# Altium PCB Copy before routing of BetaBake..PcbDoc (part 1 of 4)
Units mil, origin at the board's own origin, x right, y up, seen from the top; angles counter-clockwise.
Board outline 6000 x 4000 mil, 8 copper layers (Top Layer, GND Plein, Signal 2, PWR, GND Plein 2, Signal 3, GND Plein 3, Bottom Layer), stack 40.468 mil thick; 436 components, 343 nets, 1746 pads, 14 vias.
Unrouted connection lines stored in the file: 1158.
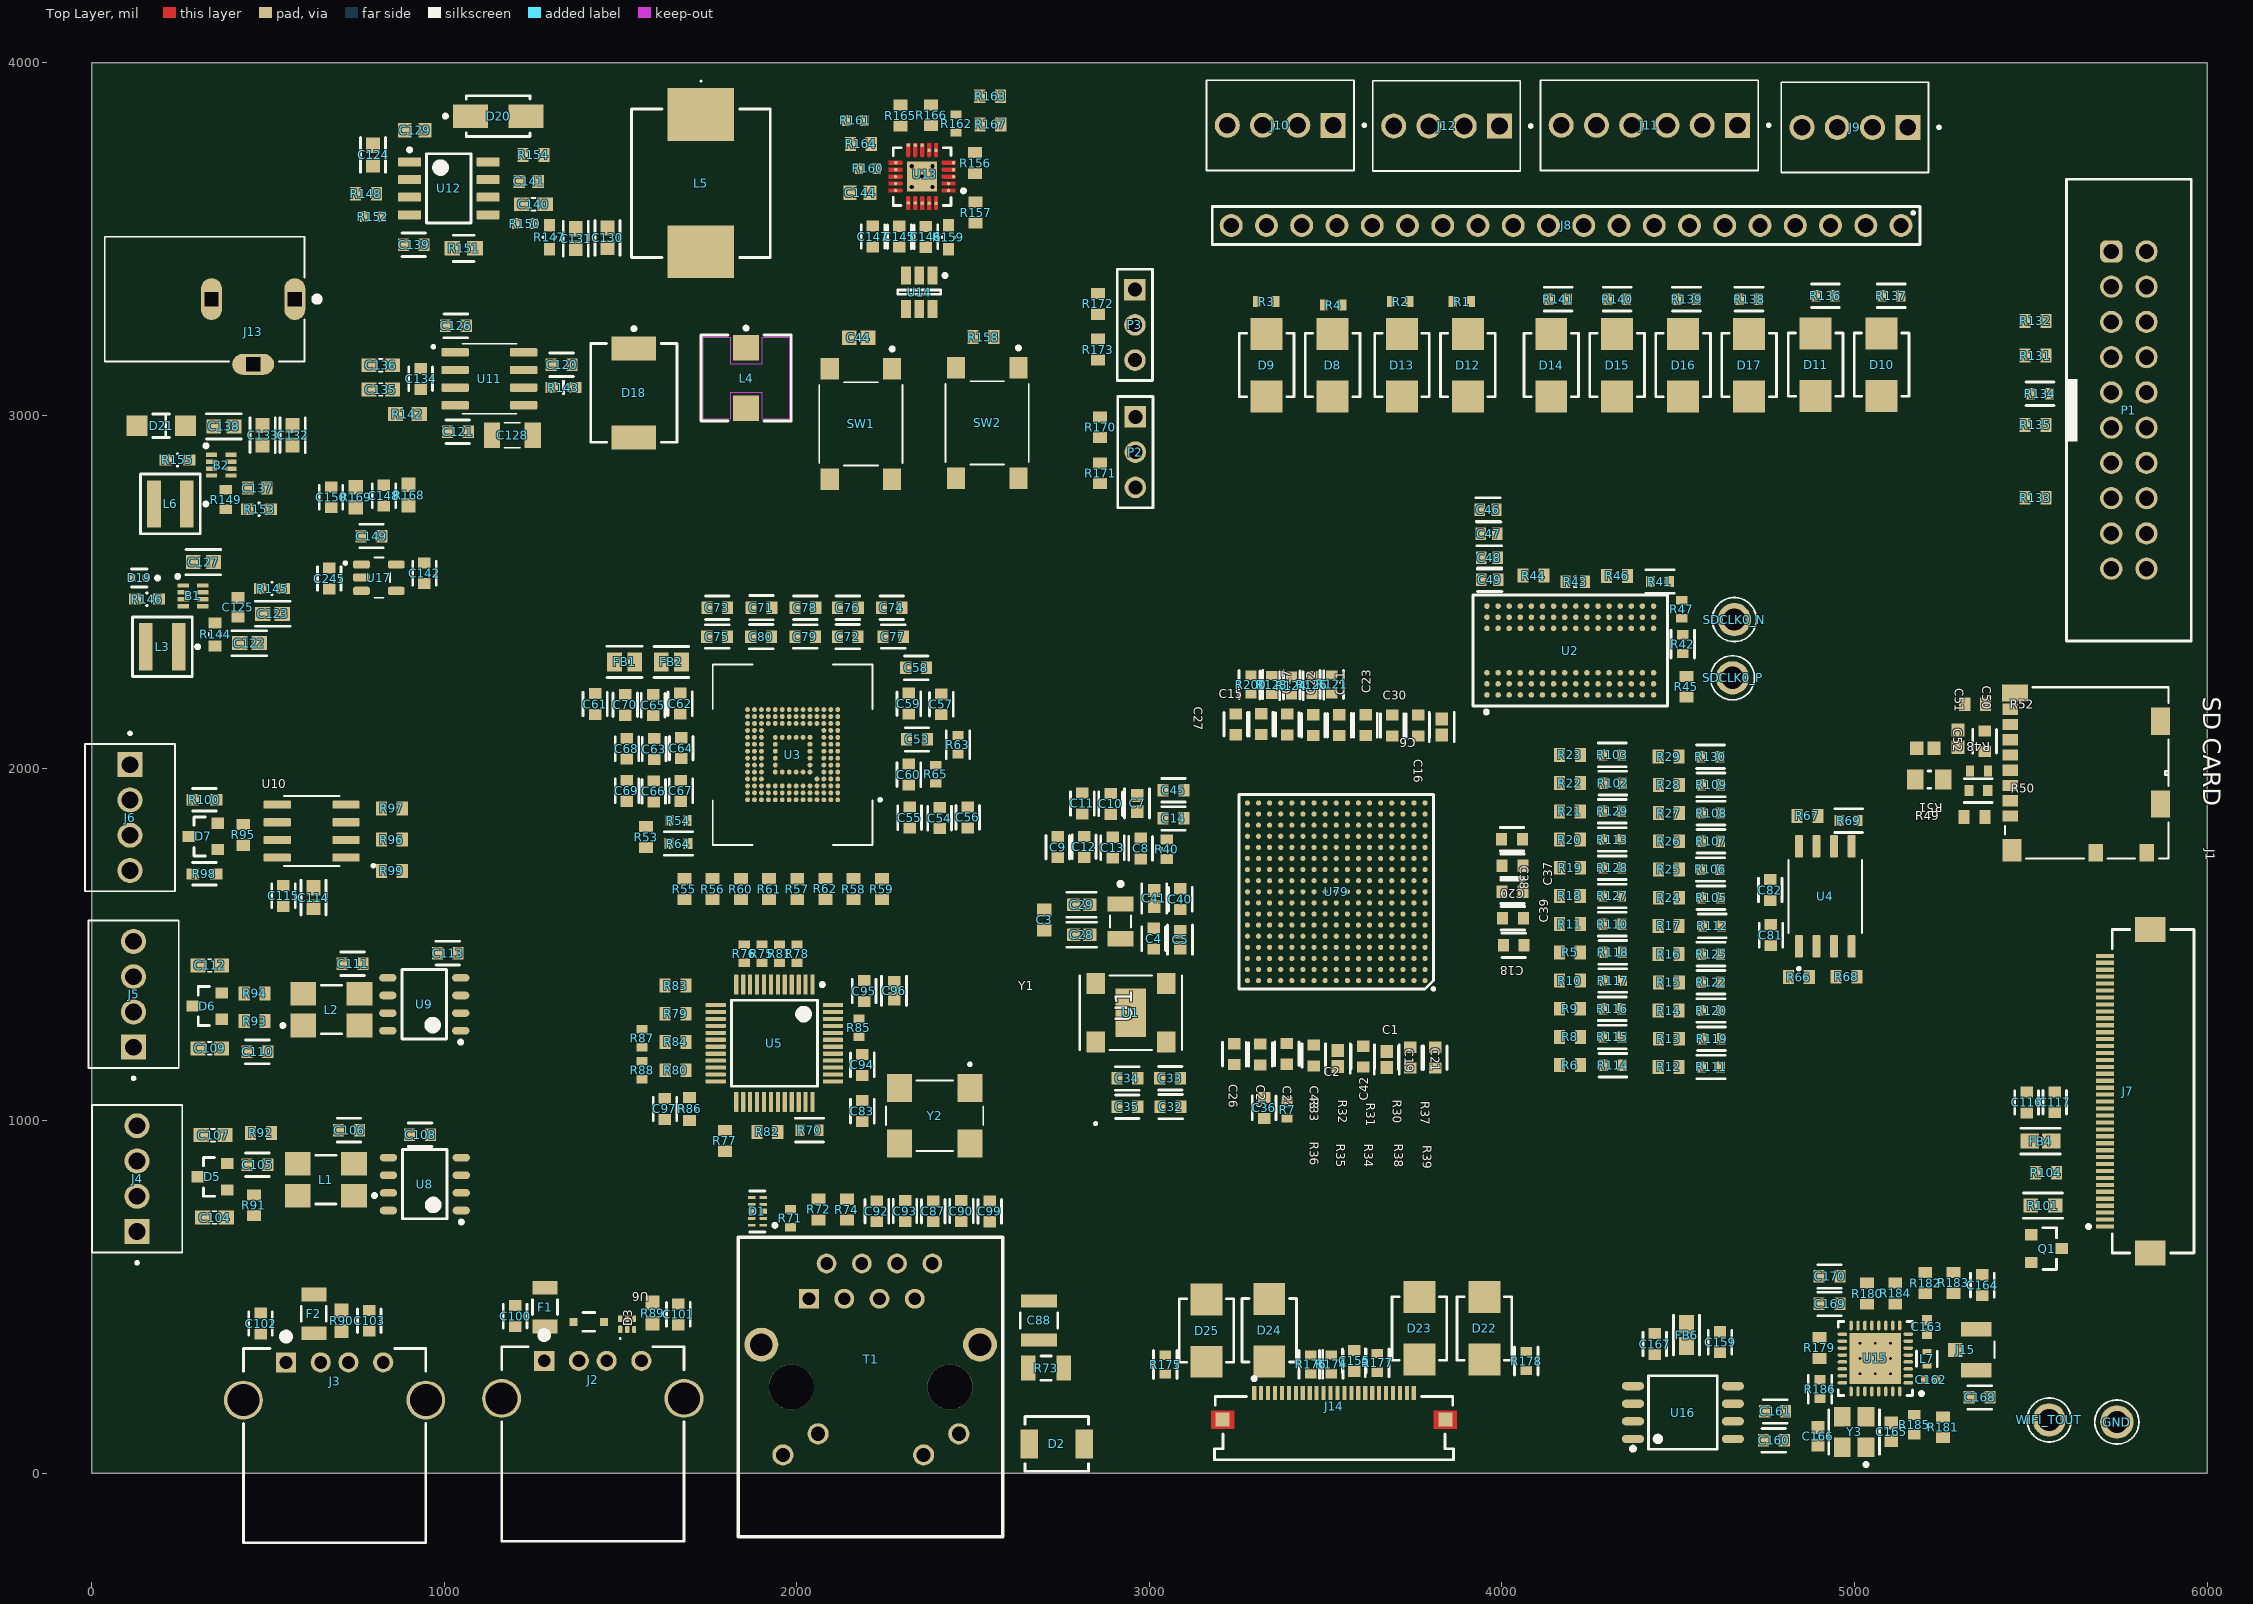
[diagram p0: Top Layer view]
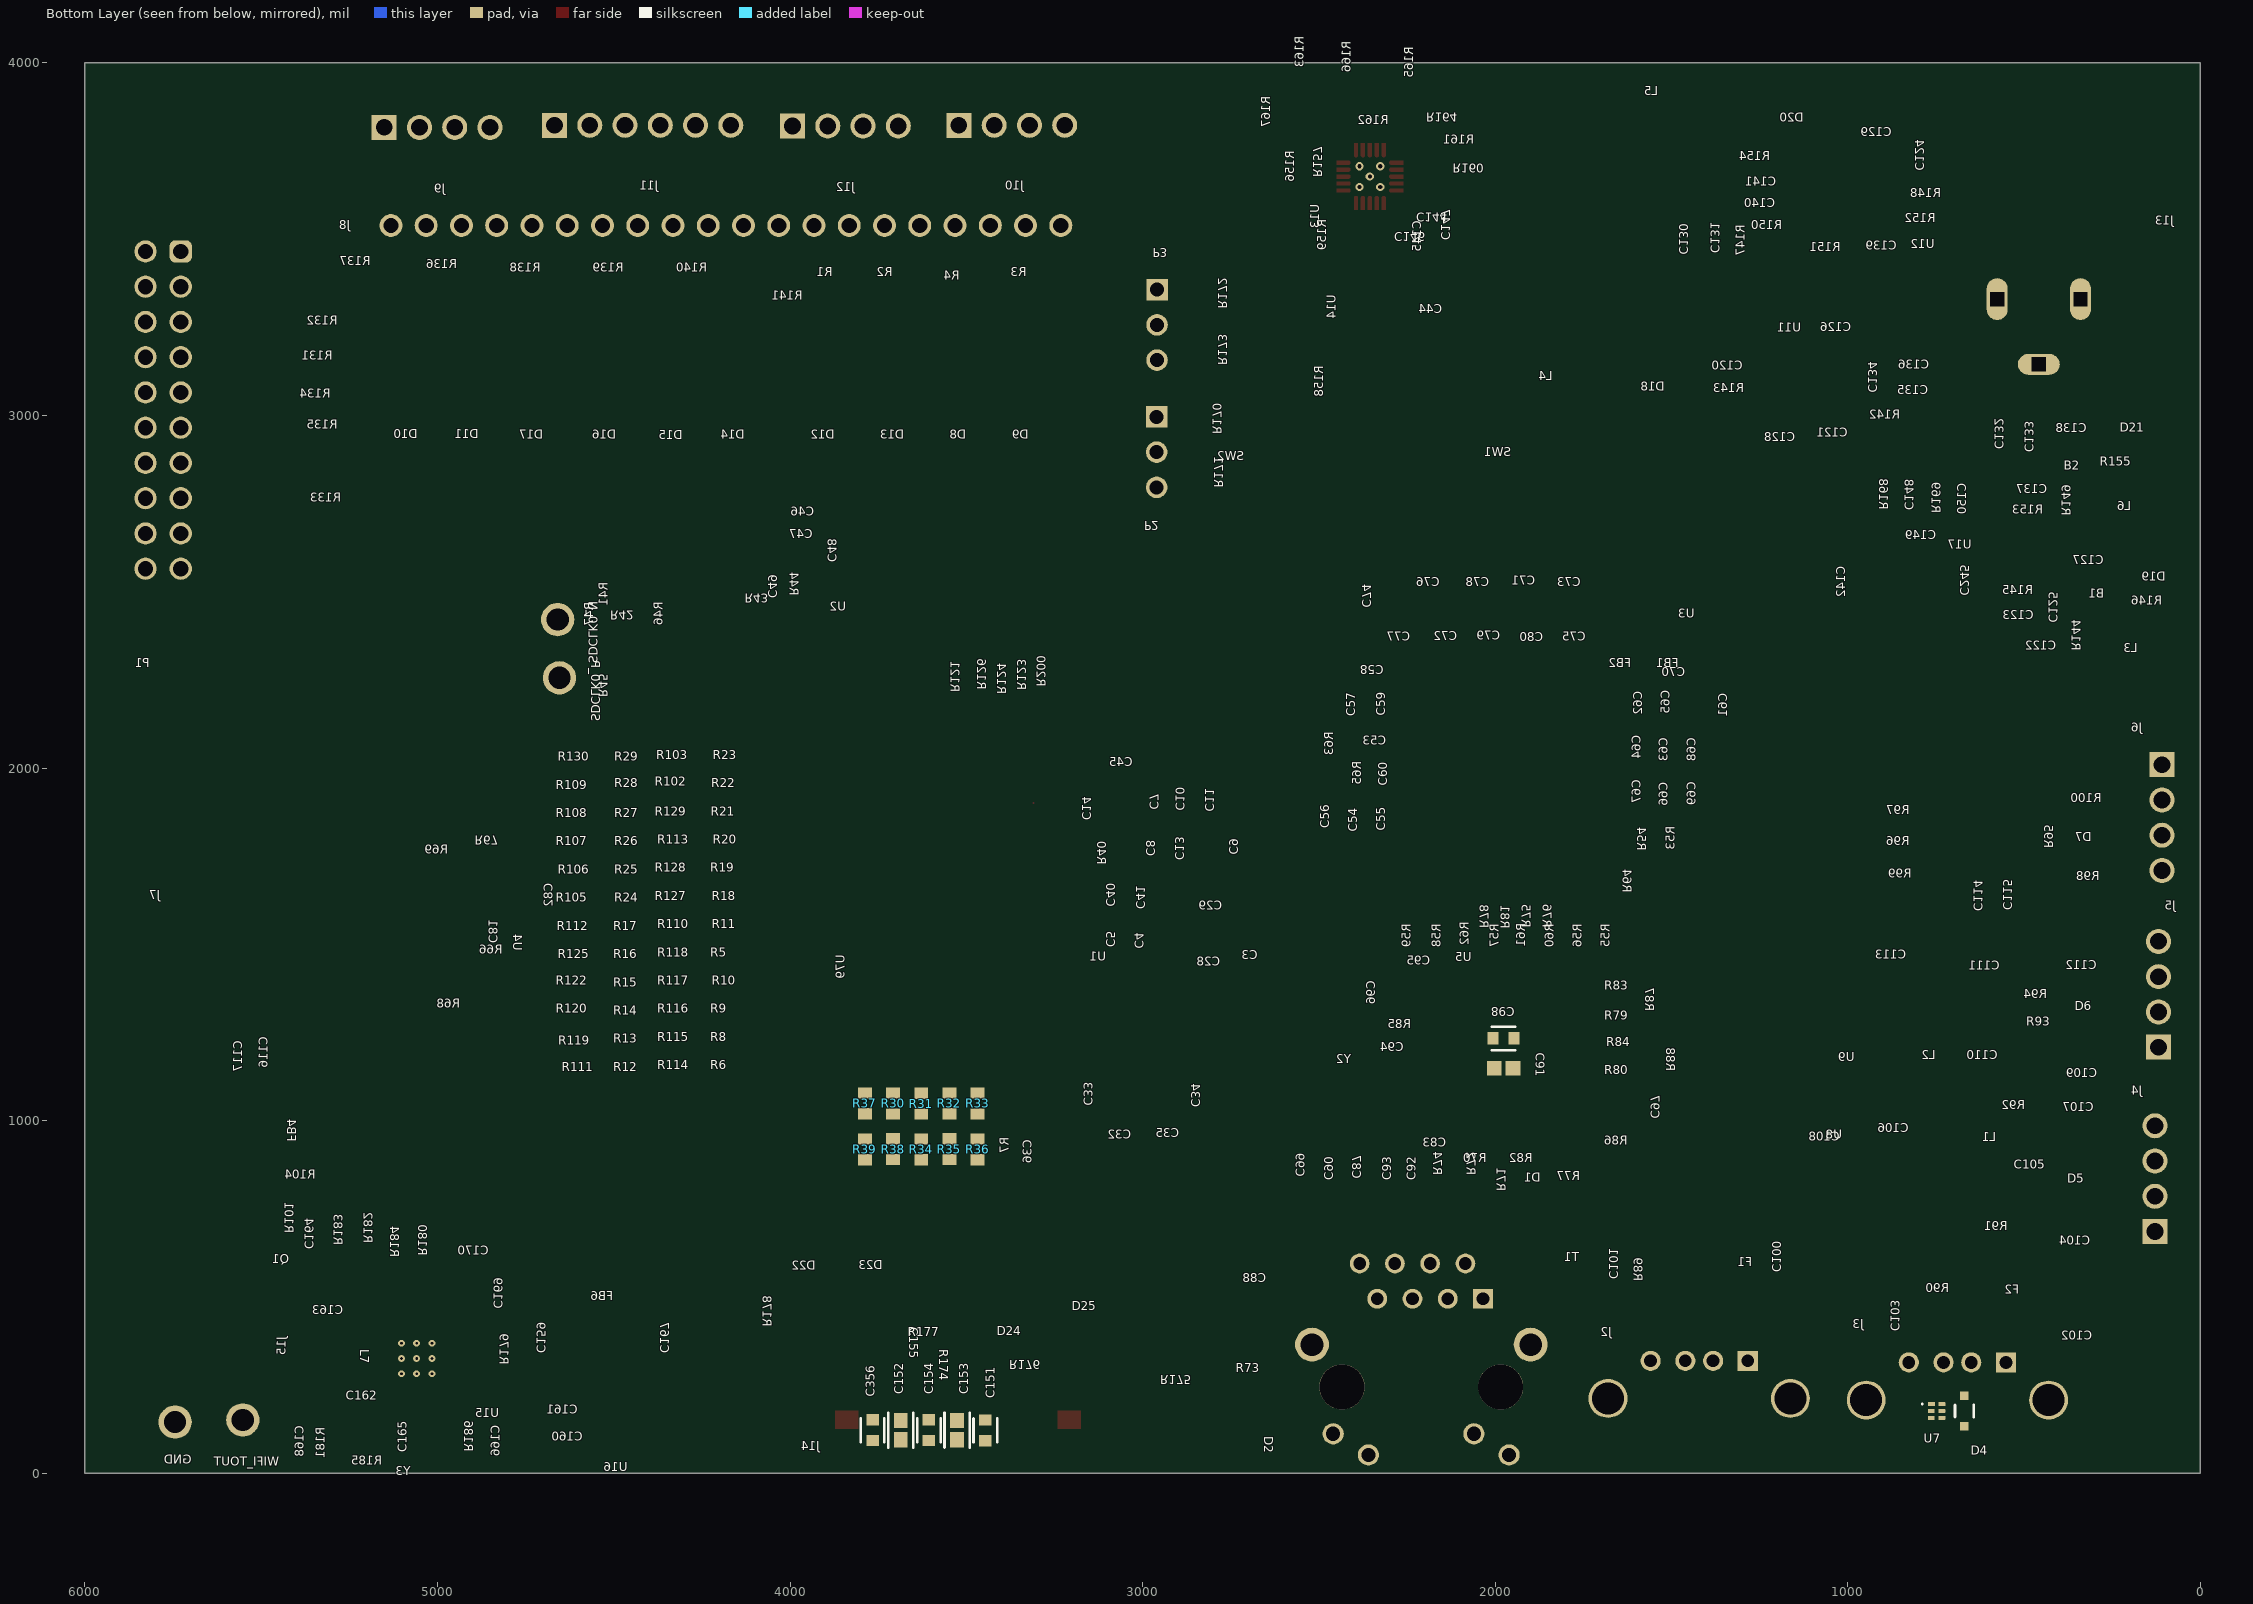
[diagram p1: Bottom Layer view, seen from below]
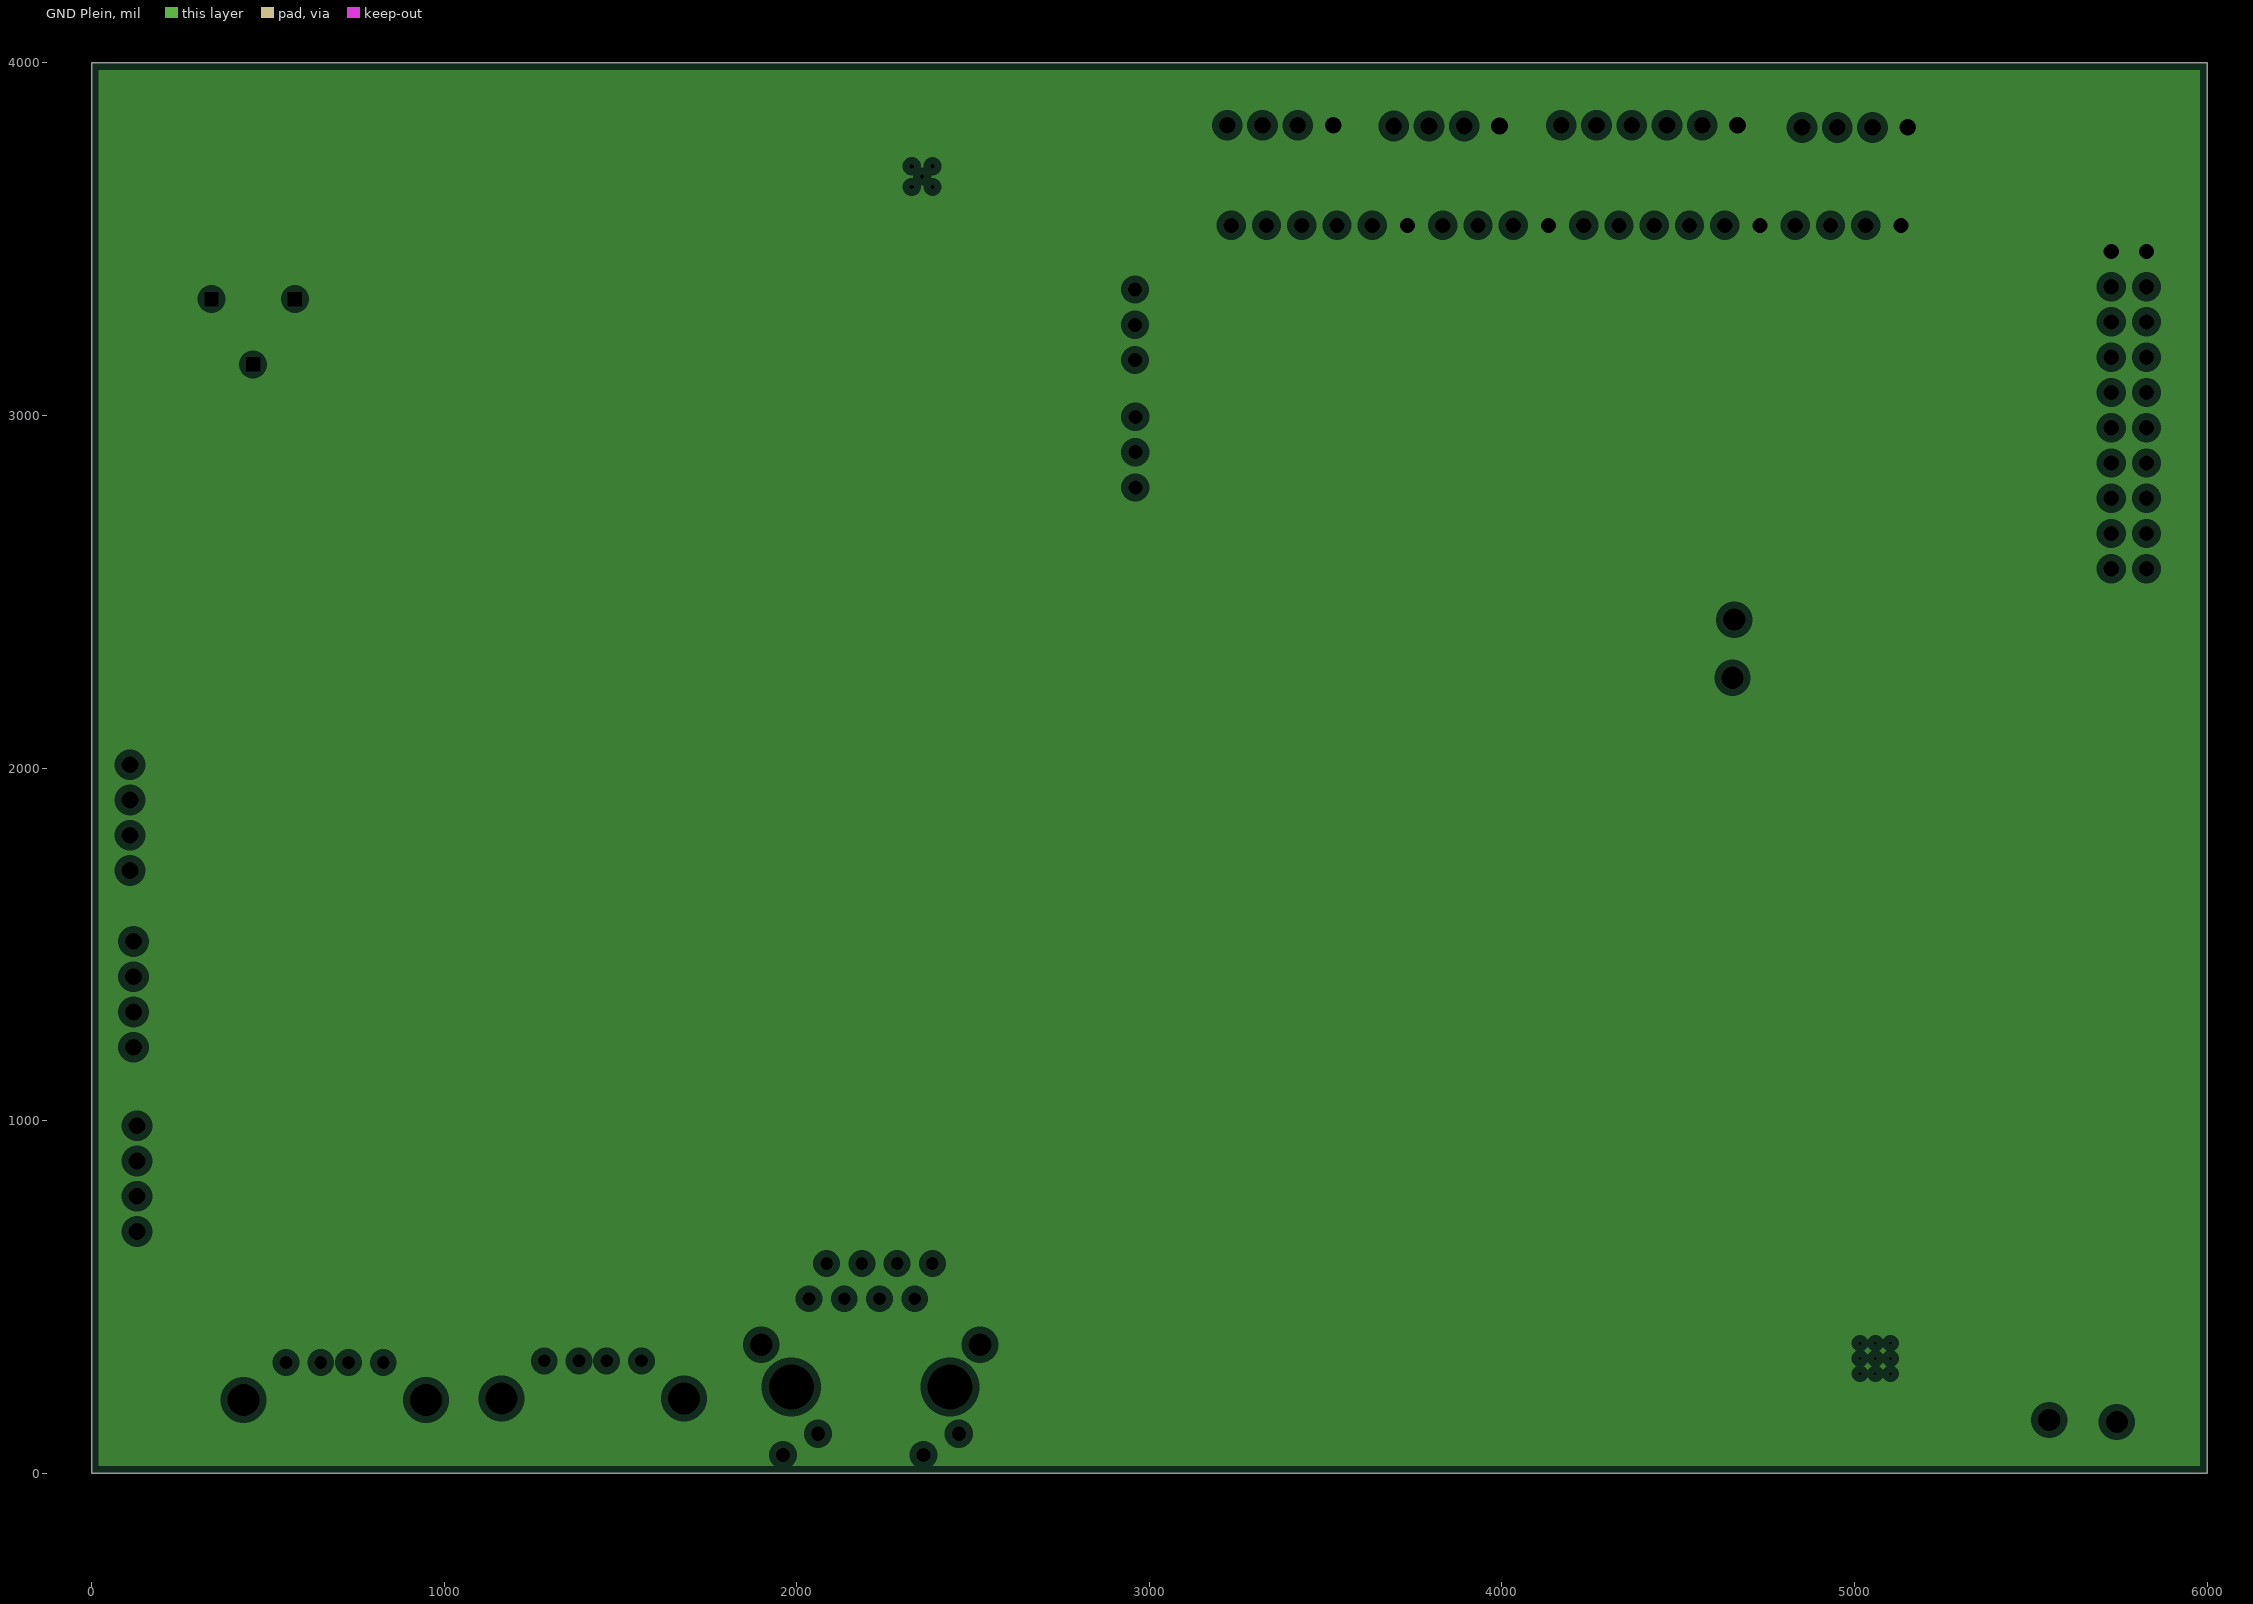
[diagram p2: GND Plein, clearances drawn from the general rule]
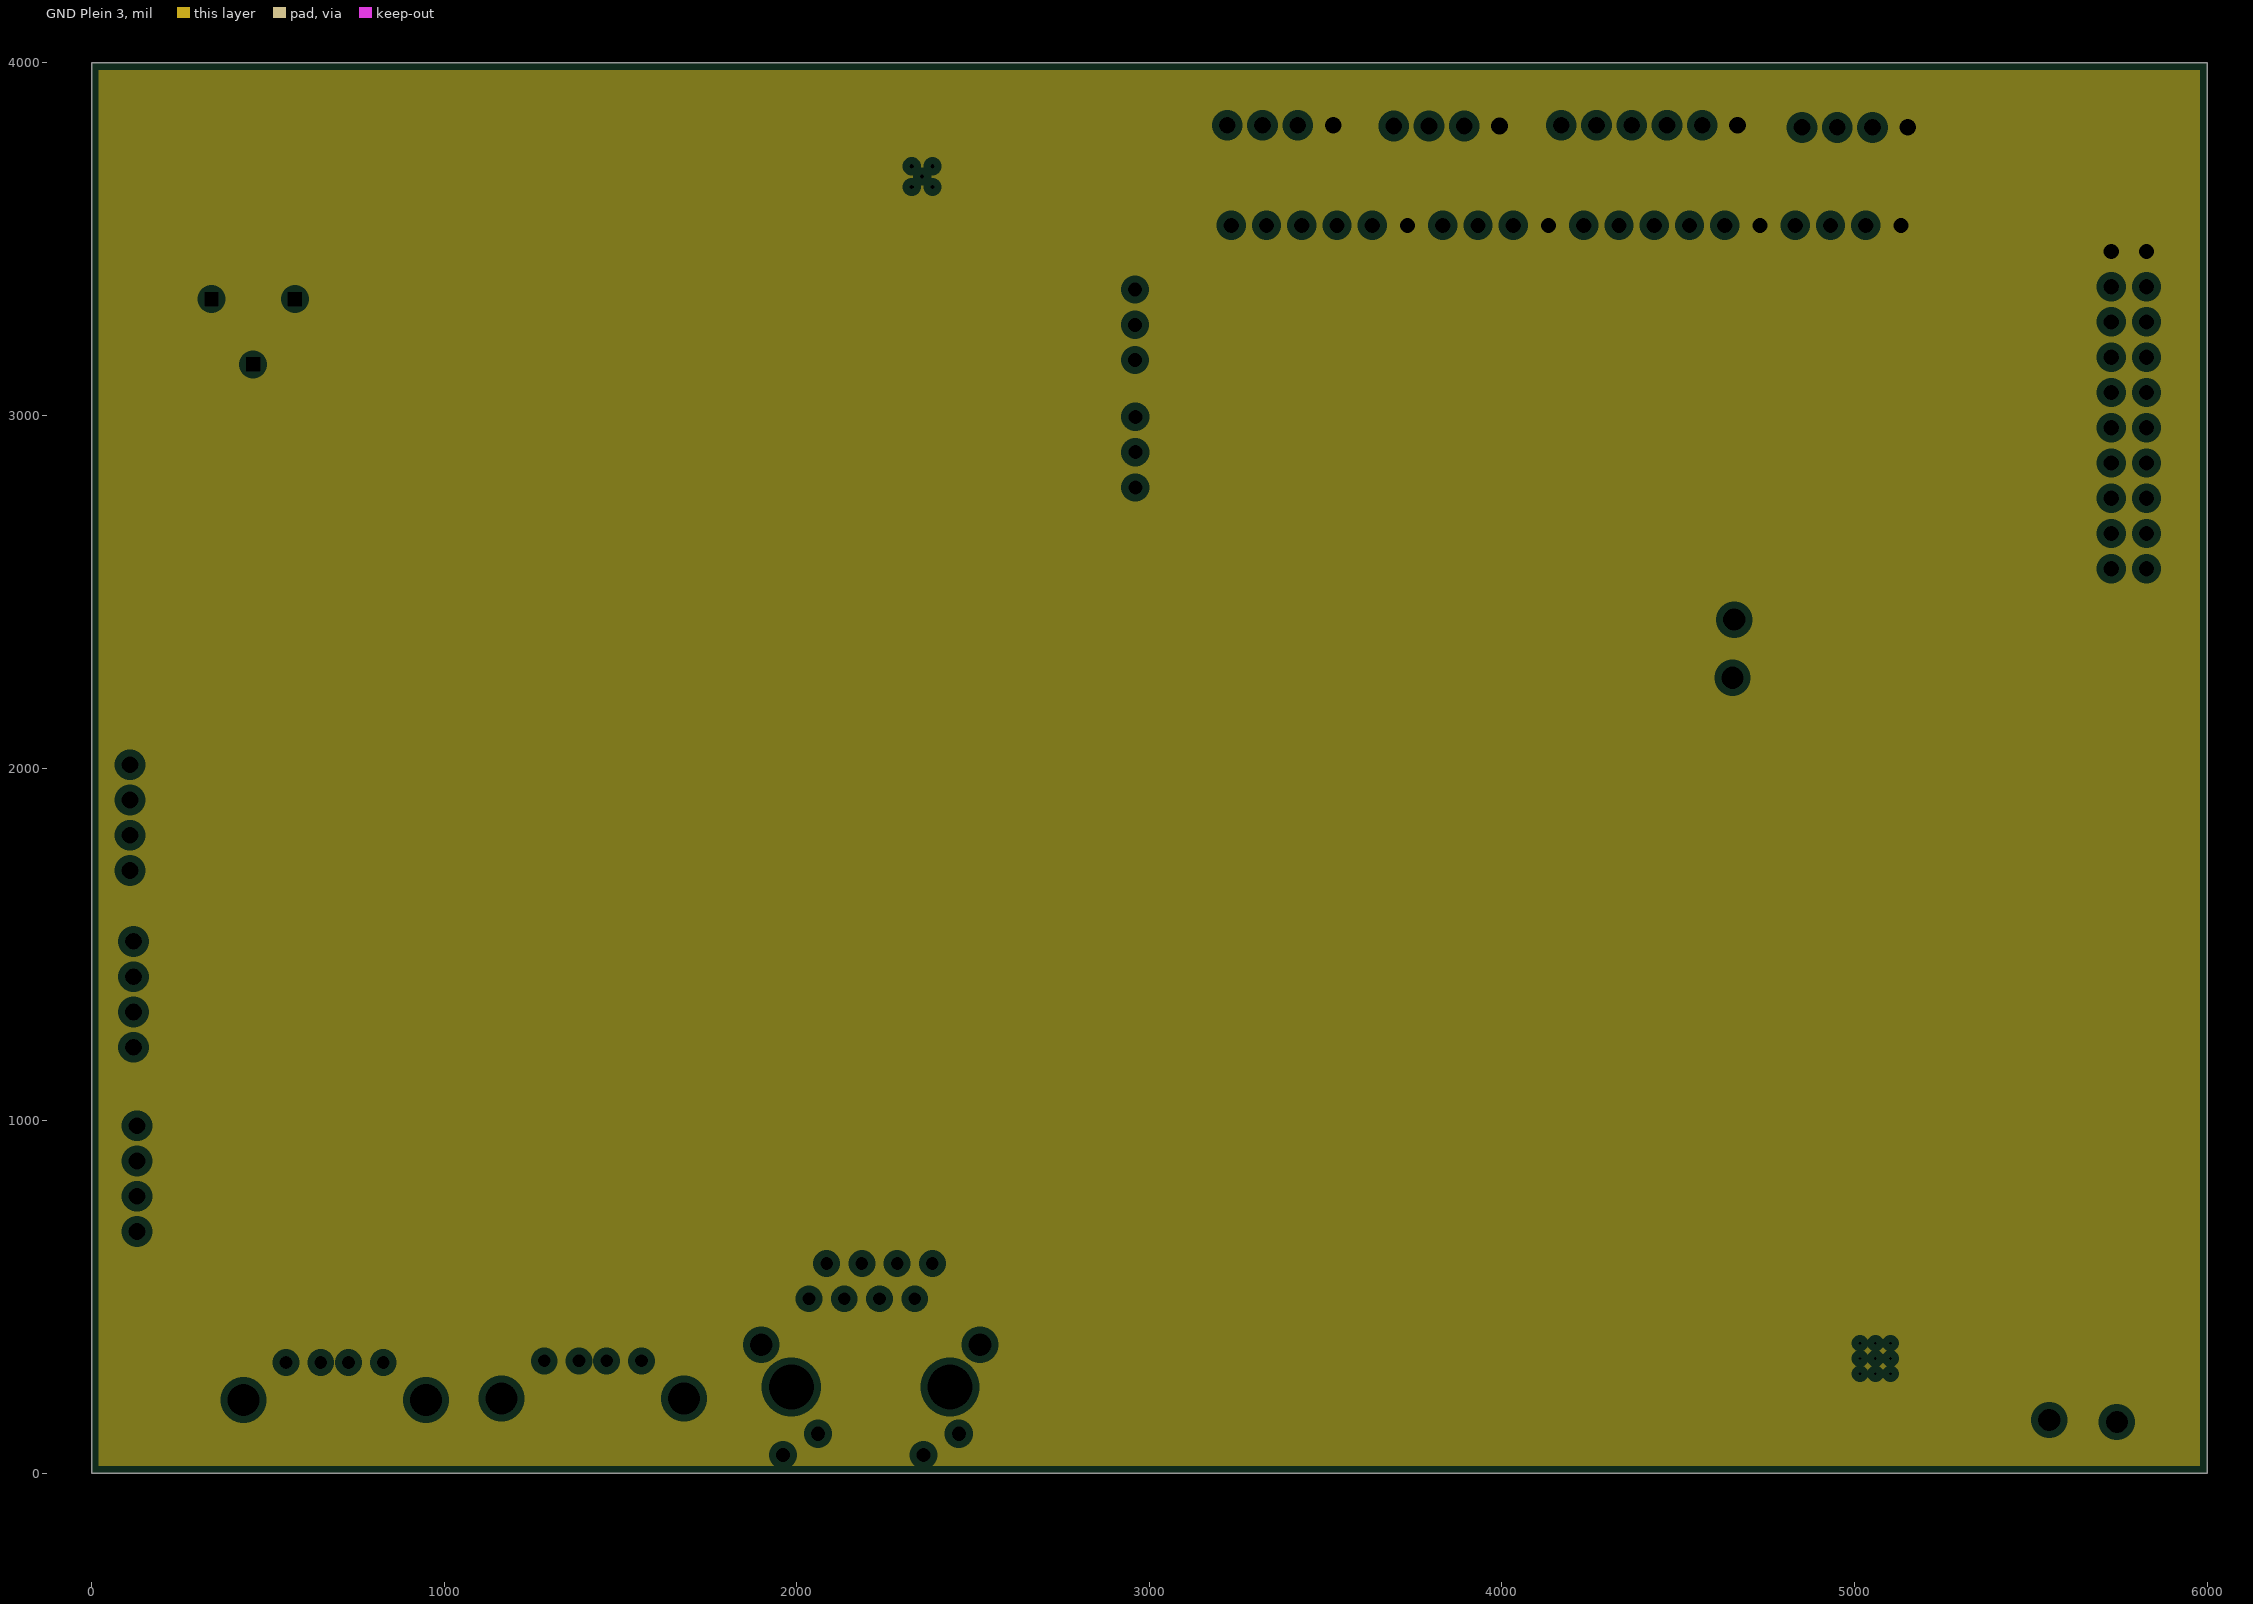
[diagram p3: GND Plein 3, clearances drawn from the general rule]

## Layer stack, top to bottom
Top Solder: solder mask 0.4, Solder Resist, Dk 3.5
Top Layer: signal copper 1.4
Dielectric 4: prepreg 2.8, PP-006, Dk 4.1
GND Plein: plane copper 1.378, net NVCC_CSI
Dielectric 2: prepreg 2.8, PP-006, Dk 4.1
Signal 2: signal copper 1.378
Dielectric 6: prepreg 2.8, PP-006, Dk 4.1
PWR: signal copper 1.378
Dielectric 1: dielectric 12.6, FR-4, Dk 4.8
GND Plein 2: signal copper 1.378
Dielectric 7: prepreg 2.8, PP-006, Dk 4.1
Signal 3: signal copper 1.378
Dielectric 3: prepreg 2.8, PP-006, Dk 4.1
GND Plein 3: plane copper 1.378, net NVCC_CSI
Dielectric 5: prepreg 2.8, PP-006, Dk 4.1
Bottom Layer: signal copper 1.4
Bottom Solder: solder mask 0.4, Solder Resist, Dk 3.5

## Board outline
0,0 6000,0 6000,4000 0,4000

## Design rules (kind name [scope] priority, off if disabled: settings)
Clearance [All] p1: gap=5 ignorepadtopadclearanceinfootprint=FALSE
DiffPairsRouting [All] p1: maxlimit=10 minlimit=10 mostfreqgap=10 toplayer_minwidth=15 toplayer_maxwidth=15 toplayer_prefwidth=15 midlayer1_minwidth=15 midlayer1_maxwidth=15 midlayer1_prefwidth=15 midlayer2_minwidth=15 midlayer2_maxwidth=15 midlayer2_prefwidth=15 midlayer3_minwidth=15 midlayer3_maxwidth=15 midlayer3_prefwidth=15 midlayer4_minwidth=15 midlayer4_maxwidth=15 midlayer4_prefwidth=15 bottomlayer_minwidth=15 bottomlayer_maxwidth=15 bottomlayer_prefwidth=15 maxuncoupledlength=500
PlaneClearance [All] p1: clearance=20
PlaneConnect [All] p1: planeconnectstyle=Relief reliefexpansion=20 reliefentries=4 reliefconductorwidth=10 reliefairgap=10
PolygonConnect [All] p1: connectstyle=Relief reliefconductorwidth=10 reliefentries=4 polygonreliefangle="90 Angle" airgapwidth=10
RoutingVias [All] p1: holewidth=28 width=50 viastyle="Through Hole" minholewidth=28 minwidth=50 maxholewidth=28 maxwidth=50
SolderMaskExpansion [All] p1: expansion=4 istentingtop=FALSE
Width [All] p1: maxlimit=60 minlimit=1 preferedwidth=10
27 further rules are at their usual default settings.

## Classes and differential pairs
net class EMMC_DATA[7..0]: EMMC_DATA0 EMMC_DATA1 EMMC_DATA2 EMMC_DATA3 EMMC_DATA4 EMMC_DATA5 EMMC_DATA6 EMMC_DATA7
net class DRAM_DATA[15..0]: DRAM_DATA0 DRAM_DATA1 DRAM_DATA2 DRAM_DATA3 DRAM_DATA4 DRAM_DATA5 DRAM_DATA6 DRAM_DATA7 DRAM_DATA8 DRAM_DATA9 DRAM_DATA10 DRAM_DATA11 DRAM_DATA12 DRAM_DATA13 DRAM_DATA14 DRAM_DATA15
net class DRAM_ADDR[15..0]: DRAM_ADDR0 DRAM_ADDR1 DRAM_ADDR2 DRAM_ADDR3 DRAM_ADDR4 DRAM_ADDR5 DRAM_ADDR6 DRAM_ADDR7 DRAM_ADDR8 DRAM_ADDR9 DRAM_ADDR10 DRAM_ADDR11 DRAM_ADDR12 DRAM_ADDR13 DRAM_ADDR14 DRAM_ADDR15
net class CSI_DATA[7..0]: CSI_DATA0 CSI_DATA1 CSI_DATA2 CSI_DATA3 CSI_DATA4 CSI_DATA5 CSI_DATA6 CSI_DATA7
component class WIFI: C162 C163 C164 C165 C166 C167 C168 C169 C170 GND J15 L7 R179 R180 R181 R182 R183 R184 R185 R186 TP118 TP119 U15 U16 WIFI_TOUT Y3
component class CSI: C151 C152 C153 C154 C155 D22 D23 D24 D25 J14 R174 R175 R176 R177 R178
component class Boot_Cfg: P2 P3 R170 R171 R172 R173
component class 09_Power: B1 B2 C120 C121 C122 C123 C124 C125 C126 C127 C128 C129 C130 C131 C132 C133 C134 C135 C136 C137 C138 C139 C140 C141 C142 C144 C145 C146 C147 C148 C149 C150 C159 C160 C161 C245 D18 D19 D20 D21 FB6 J13 L3 L4 L5 L6 lll R142 R143 R144 R145 R146 R147 R148 R149 R150 R151 R152 R153 R154 R155 R156 R157 R158 R159 R160 R161 R162 R163 R164 R165 R166 R167 R168 R169 SW2 U11 U12 U13 U14 U17
component class 08_Debug: C356 D8 D9 D10 D11 D12 D13 D14 D15 D16 D17 J8 J9 J10 J11 J12 P1 R131 R132 R133 R134 R135 R136 R137 R138 R139 R140 R141
component class 07_Display_LCD: C116 C117 FB4 J7 Q1 R5 R6 R8 R9 R10 R11 R12 R13 R14 R15 R16 R17 R18 R19 R20 R21 R22 R23 R24 R25 R26 R27 R28 R29 R101 R102 R103 R104 R105 R106 R107 R108 R109 R110 R111 R112 R113 R114 R115 R116 R117 R118 R119 R120 R121 R122 R123 R124 R125 R126 R127 R128 R129 R130 R200
component class 06_CAN_RS485: C104 C105 C106 C107 C108 C109 C110 C111 C112 C113 C114 C115 D5 D6 D7 J4 J5 J6 L1 L2 R91 R92 R93 R94 R95 R96 R97 R98 R99 R100 U8 U9 U10
component class 05_USB: C100 C101 C102 C103 D3 D4 F1 F2 J2 J3 R89 R90 U6 U7
component class 04_Ethernet: C83 C87 C88 C90 C91 C92 C93 C94 C95 C96 C97 C98 C99 D1 D2 FB3 R70 R71 R72 R73 R74 R75 R76 R77 R78 R79 R80 R81 R82 R83 R84 R85 R86 R87 R88 T1 U5 Y2
component class 03_Boot_Memory: C50 C51 C52 C53 C54 C55 C56 C57 C58 C59 C60 C61 C62 C63 C64 C65 C66 C67 C68 C69 C70 C71 C72 C73 C74 C75 C76 C77 C78 C79 C80 C81 C82 FB1 FB2 J1 R48 R49 R50 R51 R52 R53 R54 R55 R56 R57 R58 R59 R60 R61 R62 R63 R64 R65 R66 R67 R68 R69 U3 U4
component class 02_DDR3L: C46 C47 C48 C49 R41 R42 R43 R44 R45 R46 R47 SDCLK0_N SDCLK0_P TP33 TP34 U2
component class 01_CPU_Core: C1 C2 C3 C4 C5 C6 C7 C8 C9 C10 C11 C12 C13 C14 C15 C16 C17 C18 C19 C20 C21 C22 C23 C24 C25 C26 C27 C28 C29 C30 C31 C32 C33 C34 C35 C36 C37 C38 C39 C40 C41 C42 C43 C44 C45 R1 R2 R3 R4 R7 R30 R31 R32 R33 R34 R35 R36 R37 R38 R39 R40 SW1 U1 U79 Y1
differential pair DRAM_SDQS1: +DRAM_SDQS1_P -DRAM_SDQS1_N
differential pair TD: +TD_P -TD_N
differential pair RD: +RD_P -RD_N

## Components (designator, comment, footprint, x,y, rotation, side; value= is the part's Value field where it differs from the comment)
B1 "TPS62822DLCR" SON50P150X200X100-8N 287.42,2488.53 r0 top
B2 "TPS62822DLCR" SON50P150X200X100-8N 367.42,2858.84 r0 top
C1 "10uF" FP-CC0603-DC-IPC_C 3673,1173.53 r270 top
C2 "220nF" FP-CC0603-DA-MFG 3606,1181.53 r270 top value="220 nF"
C3 "0.1 uF" CAPC1608X90X35ML10T15 2702,1569 r90 top
C4 "220nF" FP-CC0603-DA-MFG 3012,1516 r270 top value="220 nF"
C5 "10uF" FP-CC0603-DC-IPC_C 3087,1513 r270 top
C6 "10uF" FP-CC0603-DC-IPC_C 3829,2116.66 r90 top
C7 "10uF" FP-CC0603-DC-IPC_C 2965,1899.66 r90 top
C8 "220nF" FP-CC0603-DA-MFG 2975,1772 r270 top value="220 nF"
C9 "220nF" FP-CC0603-DA-MFG 2740,1775.47 r270 top value="220 nF"
C10 "220nF" FP-CC0603-DA-MFG 2890,1898.53 r90 top value="220 nF"
C11 "220nF" FP-CC0603-DA-MFG 2810,1899.47 r90 top value="220 nF"
C12 "220nF" FP-CC0603-DA-MFG 2815,1776.53 r270 top value="220 nF"
C13 "220nF" FP-CC0603-DA-MFG 2895.51,1774.23 r270 top value="220 nF"
C14 "220nF" FP-CC0603-DA-MFG 3068.47,1857 r180 top value="220 nF"
C15 "220nF" FP-CC0603-DA-MFG 3245,2124 r90 top value="220 nF"
C16 "220nF" FP-CC0603-DA-MFG 3689,2120.53 r90 top value="220 nF"
C17 "220nF" FP-CC0603-DA-MFG 3391,2123.47 r90 top value="220 nF"
C18 "22uF" FP-CC0603-DC-MFG 4033.53,1497 r0 top
C19 "220nF" FP-CC0603-DA-MFG 3811,1178.53 r270 top value="220 nF"
C20 "220nF" FP-CC0603-DA-MFG 4031,1574 r0 top value="220 nF"
C21 "220nF" FP-CC0603-DA-MFG 3740,1178.53 r270 top value="220 nF"
C22 "220nF" FP-CC0603-DA-MFG 3465,2121.53 r90 top value="220 nF"
C23 "220nF" FP-CC0603-DA-MFG 3613,2121.53 r90 top value="220 nF"
C24 "22uF" FP-CC0603-DC-MFG 3390,1189.53 r270 top
C25 "220nF" FP-CC0603-DA-MFG 3315,1187.53 r270 top value="220 nF"
C26 "220nF" FP-CC0603-DA-MFG 3241,1188.53 r270 top value="220 nF"
C27 "220nF" FP-CC0603-DA-MFG 3317,2124.53 r90 top value="220 nF"
C28 "10uF" FP-CC0603-DC-IPC_C 2808.17,1526.98 r180 top
C29 "10uF" FP-CC0603-DC-IPC_C 2807.84,1611.98 r180 top
C30 "220nF" FP-CC0603-DA-MFG 3762,2120.53 r270 top value="220 nF"
C31 "220nF" FP-CC0603-DA-MFG 3539,2121.53 r270 top value="220 nF"
C32 "22uF" FP-CC0603-DC-MFG 3060.1,1040 r0 top
C33 "220nF" FP-CC0603-DA-MFG 3059,1120 r0 top value="220 nF"
C34 "220nF" FP-CC0603-DA-MFG 2937.34,1119.49 r180 top value="220 nF"
C35 "220nF" FP-CC0603-DA-MFG 2937.34,1039.49 r180 top value="220 nF"
C36 "220nF" FP-CC0603-DA-MFG 3325.5,1036.04 r90 top value="220 nF"
C37 "4.7uF" FP-CC0603-DA-MFG 4030,1723 r0 top value="4.7 uF"
C38 "220nF" FP-CC0603-DA-MFG 4028.47,1798 r0 top value="220 nF"
C39 "220nF" FP-CC0603-DA-MFG 4030,1649 r0 top value="220 nF"
C40 "100 nF" FP-CC0603-DA-MFG 3088,1628 r270 top
C41 "10uF" FP-CC0603-DC-IPC_C 3014,1630 r270 top
C42 "10uF" FP-CC0603-DC-IPC_C 3534,1176.19 r270 top
C43 "220nF" FP-CC0603-DA-MFG 3466,1184.53 r270 top value="220 nF"
C44 "100 pF" CAPC1608X90X40ML10T20 2175.43,3221 r0 top
C45 "220nF" FP-CC0603-DA-MFG 3068.47,1937 r180 top value="220 nF"
C46 "2.2 pF" FP-C0603C-CF-MFG 3961,2733 r0 top
C47 "2.2 pF" FP-C0603C-CF-MFG 3963,2664 r0 top
C48 "2.2 pF" FP-C0603C-CF-MFG 3964.62,2597 r180 top
C49 "2.2 pF" FP-C0603C-CF-MFG 3965.38,2534 r180 top
C50 "220nF" FP-CC0603-DA-MFG 5369,2076 r270 top value="220 nF"
C51 "18 pF" CAPC1608X90X40NL10T20 5293,2083.39 r270 top
C52 "18 pF" CAPC1608X90X40NL10T20 5201,2056 r180 top
C53 "100 nF" FP-CC0603-DA-MFG 2341,2081 r0 top
C54 "100 nF" FP-CC0603-DA-MFG 2405,1858 r270 top
C55 "100 nF" FP-CC0603-DA-MFG 2320,1859.53 r270 top
C56 "4.7uF" FP-CC0603-DA-MFG 2485,1860 r270 top value="4.7 uF"
C57 "100 nF" FP-CC0603-DA-MFG 2410,2181 r270 top
C58 "4.7uF" FP-CC0603-DA-MFG 2338.53,2284 r0 top value="4.7 uF"
C59 "100 nF" FP-CC0603-DA-MFG 2318,2182.53 r270 top
C60 "2.2 uF" FP-CC0603-DA-MFG 2318,1981.47 r90 top
C61 "22 uF" FP-CC0603-DC-MFG 1428,2181.53 r270 top
C62 "22 uF" FP-CC0603-DC-MFG 1669,2182.53 r270 top
C63 "100 nF" FP-CC0603-DA-MFG 1595.26,2053.83 r270 top
C64 "100 nF" FP-CC0603-DA-MFG 1672.26,2056.31 r270 top
C65 "100 nF" FP-CC0603-DA-MFG 1592.32,2178.32 r90 top
C66 "100 nF" FP-CC0603-DA-MFG 1594.37,1933.76 r90 top
C67 "100 nF" FP-CC0603-DA-MFG 1671.37,1935.28 r90 top
C68 "100 nF" FP-CC0603-DA-MFG 1518.32,2054.8 r270 top
C69 "100 nF" FP-CC0603-DA-MFG 1518.32,1935.27 r90 top
C70 "22 uF" FP-CC0603-DC-MFG 1513.32,2179.32 r270 top
C71 "22 uF" FP-CC0603-DC-MFG 1899.79,2454.8 r0 top
C72 "22 uF" FP-CC0603-DC-MFG 2144.47,2373 r0 top
C73 "100 nF" FP-CC0603-DA-MFG 1774.32,2454.8 r0 top
C74 "100 nF" FP-CC0603-DA-MFG 2269.32,2454.8 r0 top
C75 "100 nF" FP-CC0603-DA-MFG 1774,2373 r0 top
C76 "100 nF" FP-CC0603-DA-MFG 2144.79,2454.8 r180 top
C77 "100 nF" FP-CC0603-DA-MFG 2273.53,2373 r0 top
C78 "100 nF" FP-CC0603-DA-MFG 2024.32,2454.8 r0 top
C79 "100 nF" FP-CC0603-DA-MFG 2024,2373 r0 top
C80 "22 uF" FP-CC0603-DC-MFG 1899,2373 r0 top
C81 "100 nF" FP-CC0603-DA-MFG 4763,1526 r270 top
C82 "4.7uF" FP-CC0603-DA-MFG 4761,1654 r270 top value="4.7 uF"
C83 "100 nF" FP-CC0603-DA-MFG 2186,1027 r90 top
C87 "100 nF" FP-CC0603-DA-MFG 2387,743 r90 top
C88 "4.7 nF" FP-C1210C472KGRAC7800-MFG 2687,433.12 r270 top
C90 "100 nF" FP-CC0603-DA-MFG 2467,743.47 r270 top
C91 "100 pF" CAPC1608X90X40ML10T20 1976,1148 r180 bottom
C92 "100 nF" FP-CC0603-DA-MFG 2227,743 r270 top
C93 "100 nF" FP-CC0603-DA-MFG 2307,743.47 r270 top
C94 "100 nF" FP-CC0603-DA-MFG 2186,1158 r90 top
C95 "100 nF" FP-CC0603-DA-MFG 2191,1367.53 r90 top
C96 "10uF" FP-CC0603-DC-IPC_C 2276,1368 r90 top
C97 "100 nF" FP-CC0603-DA-MFG 1626,1033 r270 top
C98 "100 nF" FP-CC0603-DA-MFG 1976.47,1233 r180 bottom
C99 "100 nF" FP-CC0603-DA-MFG 2547,742.53 r270 top
C100 "100 nF" FP-CC0603-DA-MFG 1201,445.53 r90 top
C101 "1uF" FP-CC0603-DA-MFG 1664,450.47 r270 top value="1 uF"
C102 "100 nF" FP-CC0603-DA-MFG 479,424.53 r90 top
C103 "1uF" FP-CC0603-DA-MFG 787.5,432.28 r270 top value="1 uF"
C104 "47 pF" CAPC1608X90 348.46,725 r0 top
C105 "4.7 nF" FP-CC0603-DA-MFG 470,875 r0 top
C106 "100 nF" FP-CC0603-DA-MFG 730,973 r0 top
C107 "47 pF" CAPC1608X90 344.65,958.78 r180 top
C108 "100 nF" FP-CC0603-DA-MFG 931.47,960 r0 top
C109 "47 pF" CAPC1608X90 335,1205 r0 top
C110 "4.7 nF" FP-CC0603-DA-MFG 470,1195 r0 top
C111 "100 nF" FP-CC0603-DA-MFG 740,1445 r0 top
C112 "47 pF" CAPC1608X90 335,1440 r180 top
C113 "100 nF" FP-CC0603-DA-MFG 1010,1475 r0 top
C114 "10 uF" FP-GRM188-0_2-IPC_B 629,1632.58 r90 top
C115 "100 nF" FP-CC0603-DA-MFG 544,1637.53 r90 top
C116 "100 nF" FP-CC0603-DA-MFG 5488,1051.53 r90 top
C117 "100 nF" FP-CC0603-DA-MFG 5568,1052 r270 top
C120 "10 nF" FP-CC0603-DA-MFG 1333,3144 r180 top
C121 "10 nF" FP-CC0603-DA-MFG 1038.47,2954 r180 top
C122 "10 uF" FP-GRM188-0_2-IPC_B 447.56,2354 r180 top
C123 "10 uF" FP-GRM188-0_2-IPC_B 513.13,2437.48 r180 top
C124 "10 uF" FP-GRM188-0_2-IPC_B 798,3739 r270 top
C125 "120 pF" CAPC1608X90X35NL10T15 414.98,2455.57 r270 top
C126 "100 nF" FP-CC0603-DA-MFG 1033,3254 r0 top
C127 "4.7 uF" FP-0603-L_1_6_0_2-W_0_8_0-IPC_B 317,2584 r180 top
C128 "22 uF" CAPC3216X110N 1193,2944 r0 top
C129 "0.1 uF" CAPC1608X90X35ML10T15 916.54,3809 r0 top
C130 "47uF" FP-GRM188-0_2-IPC_B 1463,3504 r270 top
C131 "47uF" FP-GRM188-0_2-IPC_B 1373,3501.58 r270 top
C132 "10 uF" FP-GRM188-0_2-IPC_B 569.98,2944 r270 top
C133 "10 uF" FP-GRM188-0_2-IPC_B 484.98,2944 r270 top
C134 "10nF" FP-CC0603-DA-MFG 933,3104 r270 top value="10 nF"
C135 "47pF" CAPC1608X90 819.89,3073.57 r180 top
C136 "47pF" CAPC1608X90 819.89,3142.46 r180 top
C137 "120 pF" CAPC1608X90X35NL10T15 469.98,2794 r0 top
C138 "4.7 uF" FP-0603-L_1_6_0_2-W_0_8_0-IPC_B 374.98,2969 r180 top
C139 "10nF" FP-CC0603-DA-MFG 913.47,3484 r180 top value="10 nF"
C140 "47pF" CAPC1608X90 1253,3599 r0 top
C141 "1000 pF" CAPC1608X90X35NL10T15 1239.57,3664 r180 top
C142 "1 uF" FP-CC0603-DA-MFG 943.91,2552.4 r270 top
C144 "0.1 uF" CAPC1608X90X35ML10T15 2179.46,3632 r180 top
C145 "100 nF" FP-CC0603-DA-MFG 2291,3507 r270 top
C146 "10 nF" FP-CC0603-DA-MFG 2366,3506.53 r90 top
C147 "100 nF" FP-CC0603-DA-MFG 2216,3507.47 r270 top
C148 "100 nF" FP-CC0603-DA-MFG 829,2772.53 r270 top
C149 "4.7uF" FP-CC0603-DA-MFG 793.53,2658 r180 top value="4.7 uF"
C150 "100 nF" FP-CC0603-DA-MFG 679,2768 r90 top
C151 "100 nF" FP-CC0603-DA-MFG 3446,121.53 r90 bottom
C152 "10 uF" FP-GRM188-0_2-IPC_B 3686,122 r90 bottom
C153 "10 uF" FP-GRM188-0_2-IPC_B 3526,122 r90 bottom
C154 "100 nF" FP-CC0603-DA-MFG 3606,122 r90 bottom
C155 "100 nF" FP-CC0603-DA-MFG 3581,318.53 r270 top
C159 "100 nF" FP-CC0603-DA-MFG 4618.42,371.74 r270 top
C160 "100 nF" FP-CC0603-DA-MFG 4771,93 r0 top
C161 "1uF" FP-CC0603-DA-MFG 4775,175 r180 top value="1 uF"
C162 "2.4 pF" CAPC1005X55N 5215.5,264.83 r180 top
C163 "3.0 pF" CAPC1005X55X25ML05T10 5205.5,414.83 r270 top
C164 "100 nF" FP-CC0603-DA-MFG 5362.5,533.36 r90 top
C165 "22 pF" CAPC1608X90X40NL10T20 5104,117.61 r270 top
C166 "22 pF" CAPC1608X90X40NL10T20 4896,105 r90 top
C167 "100 nF" FP-CC0603-DA-MFG 4433.42,366.26 r270 top
C168 "100 nF" FP-CC0603-DA-MFG 5355.02,214.83 r180 top
C169 "100 nF" FP-CC0603-DA-MFG 4929,480 r0 top
C170 "100 nF" FP-CC0603-DA-MFG 4929,558 r0 top
C245 "1 uF" FP-CC0603-DA-MFG 673.91,2537.4 r90 top
C356 "100 nF" FP-CC0603-DA-MFG 3766,122 r90 bottom
D1 "TPD4E02B04DQAR" FP-DQA0010A-MFG 1888.44,742.37 r180 top
D2 "TVS" FP-SMBJ-CA-MFG 2737,83 r180 top
D3 "TVS" FP-SOD323-CA-MFG 1410,429 r180 top
D4 "TVS" FP-SOD323-CA-MFG 669.39,176.38 r90 bottom
D5 "PESD1CAN" SOT23-3 344.65,840.67 r90 top
D6 "PESD1CAN" SOT23-3 330,1325 r90 top
D7 "PESD1CAN" SOT23-3 318,1806 r90 top
D8 "TVS" WE-TVSP_DO-214AA_Bidirectional -46480.38,53142.92 r90 top
D9 "TVS" WE-TVSP_DO-214AA_Bidirectional -46667.39,53142.92 r90 top
D10 "TVS" WE-TVSP_DO-214AA_Bidirectional -44923.29,53144.3 r90 top
D11 "TVS" WE-TVSP_DO-214AA_Bidirectional -45110.3,53144.3 r90 top
D12 "TVS" WE-TVSP_DO-214AA_Bidirectional -46096.52,53142.92 r90 top
D13 "TVS" WE-TVSP_DO-214AA_Bidirectional -46283.53,53142.92 r90 top
D14 "TVS" WE-TVSP_DO-214AA_Bidirectional -45860.3,53142.92 r90 top
D15 "TVS" WE-TVSP_DO-214AA_Bidirectional -45673.29,53142.92 r90 top
D16 "TVS" WE-TVSP_DO-214AA_Bidirectional -45486.28,53142.92 r90 top
D17 "TVS" WE-TVSP_DO-214AA_Bidirectional -45299.28,53142.92 r90 top
D18 "SS34-E3/9AT" FP-SMC-MFG 1538,3064 r270 top
D19 "1V4_SOC_IN" FP-HSMC-C280-MFG 134.98,2539 r180 top
D20 "B340A-13-F" FP-SMA-MFG 1153,3849 r0 top
D21 "1V35_DRAM" FP-HSMG-C150-MFG 197.1,2971 r180 top
D22 "TVS" WE-TVSP_DO-214AA_Bidirectional 53950,-49589.42 r270 top
D23 "TVS" WE-TVSP_DO-214AA_Bidirectional 53766,-49589.42 r270 top
D24 "TVS" WE-TVSP_DO-214AA_Bidirectional 53340,-49594.42 r270 top
D25 "TVS" WE-TVSP_DO-214AA_Bidirectional 53162,-49595.42 r270 top
F1 "Fuse" FP-1206L050YR-MFG 1286,471 r90 top
F2 "Fuse" FP-1206L050YR-MFG 630.02,451.97 r90 top
FB1 "FB" FP-BLM21-0_2-t0_85-e0_5-IPC_C 1511.31,2301.03 r0 top
FB2 "FB" FP-BLM21-0_2-t0_85-e0_5-IPC_C 1644.32,2300.8 r0 top
FB4 "BLM18PG121SN1D" FP-BLM18-0_15-t0_8-IPC_A 5527.45,942 r180 top
FB6 "FB" FP-BLM18-0_15-t0_8-IPC_A 4523.42,391.74 r90 top
GND "" KEYSTONE_5277 5744,145 r180 top (schematic designator GND_7)
J1 "1040310811" 104031-0811_MOL 5659,1986 r270 top
J2 "292303-1" TE-292303-1_V 1421.32,273.58 r0 top
J3 "292303-1" TE-292303-1_V 689.08,269.13 r0 top
J4 "TB CAN_1" TE_282834-4 128.74,835.35 r90 top
J5 "TB CAN_2" TE_282834-4 118.74,1358.27 r90 top
J6 "TB RS-485" TE_282834-4 108.74,1859.45 r270 top
J7 "FH12-40S-0.5SH(55)" FP-FH12-40S-0_5SH_55-MFG 5846.83,1083.47 r90 top
J8 "Global Header" 61302011121 4182,3539 r180 top
J9 "TB UART" TE_282834-4 5001,3817 r180 top
J10 "TB I2C2" TE_282834-4 3371,3823 r180 top
J11 "TB SPI" TE_282834-6 4418,3823 r180 top
J12 "TB I2C1" TE_282834-4 3842.9,3821.06 r180 top
J13 "PJ-102AH" CUI_PJ-102AH 320.32,3330 r180 top
J14 "54548-2471" MOLX-54548-2471 3523.64,189.6 r0 top
J15 "1909763-1" TE_1909763-1 5345.54,349.83 r270 top
L1 "B82789C0513N002" FP-B82789C0513N002-0#1 664.28,832.72 r180 top
L2 "B82789C0513N002" FP-B82789C0513N002-0#2 680,1315 r0 top
L3 "470 nH" FP-XFL4015-MFG 200.35,2344 r180 top
L4 "7447785004" WE-PD_6033R 1856,3106 r270 top
L5 "6.8 uH" SPM10054T6R8MHZR 1728,3658.88 r270 top
L6 "470 nH" FP-XFL4015-MFG 223.32,2749 r180 top
L7 "2.2 nH" FP-LQW15AN_80-MFG 5205.5,324.72 r90 top
P1 "61202021621" 61202021621 5778.09,3015.3 r270 top
P2 "TSW-103-07-G-S" SMTC-TSW-103-07-X-S 2960.16,2995.99 r270 top
P3 "TSW-103-07-G-S" SMTC-TSW-103-07-X-S 2959.16,3356.99 r270 top
Q1 "N-MOSFET" FP-PG-SOT23-3-MFG 5545,637 r0 top
R1 "4.7 kΩ" RESC1608X55X25LL10T15 3886,3323 r180 top
R2 "4.7 kΩ" RESC1608X55X25LL10T15 3711,3323 r0 top
R3 "4.7 kΩ" RESC1608X55X25LL10T15 3331,3323 r0 top
R4 "4.7 kΩ" RESC1608X55X25LL10T15 3521,3313 r0 top
R5 "10 kΩ" RESC1608X55X25ML10T15 4192.42,1477.23 r0 top
R6 "10 kΩ" RESC1608X55X25ML10T15 4192.91,1157.23 r0 top
R7 "4.7K" RESC1608X55X25LL10T15 3390.5,1031.51 r90 top
R8 "10 kΩ" RESC1608X55X25ML10T15 4192.91,1237.23 r0 top
R9 "10 kΩ" RESC1608X55X25ML10T15 4192.42,1317.23 r0 top
R10 "10 kΩ" RESC1608X55X25ML10T15 4192.89,1397.23 r0 top
R11 "10 kΩ" RESC1608X55X25ML10T15 4192.89,1557.23 r0 top
R12 "10 kΩ" RESC1608X55X25ML10T15 4472.89,1152.23 r0 top
R13 "10 kΩ" RESC1608X55X25ML10T15 4473.36,1232.23 r0 top
R14 "10 kΩ" RESC1608X55X25ML10T15 4472.89,1312.23 r0 top
R15 "10 kΩ" RESC1608X55X25ML10T15 4473.36,1392.23 r0 top
R16 "10 kΩ" RESC1608X55X25ML10T15 4472.89,1472.23 r0 top
R17 "10 kΩ" RESC1608X55X25ML10T15 4472.89,1552.23 r0 top
R18 "10 kΩ" RESC1608X55X25ML10T15 4192.42,1637.23 r0 top
R19 "10 kΩ" RESC1608X55X25ML10T15 4193.36,1717.23 r0 top
R20 "10 kΩ" RESC1608X55X25ML10T15 4192.42,1797.23 r0 top
R21 "10 kΩ" RESC1608X55X25ML10T15 4192.42,1877.23 r0 top
R22 "10 kΩ" RESC1608X55X25ML10T15 4192.89,1957.23 r0 top
R23 "10 kΩ" RESC1608X55X25ML10T15 4192.89,2037.23 r0 top
R24 "10 kΩ" RESC1608X55X25ML10T15 4473.36,1632.23 r0 top
R25 "10 kΩ" RESC1608X55X25ML10T15 4473.36,1712.23 r0 top
R26 "10 kΩ" RESC1608X55X25ML10T15 4473.36,1792.23 r0 top
R27 "10 kΩ" RESC1608X55X25ML10T15 4473.36,1872.23 r0 top
R28 "10 kΩ" RESC1608X55X25ML10T15 4473.36,1952.23 r0 top
R29 "10 kΩ" RESC1608X55X25ML10T15 4472.89,2032.23 r0 top
R30 "1 MΩ" RESC1608X55X25ML10T15 3707.78,1048.66 r90 bottom
R31 "1 MΩ" RESC1608X55X25ML10T15 3627.78,1048.19 r90 bottom
R32 "1 MΩ" RESC1608X55X25ML10T15 3547.78,1049.13 r90 bottom
R33 "1 MΩ" RESC1608X55X25ML10T15 3467.78,1048.66 r90 bottom
R34 "1 MΩ" RESC1608X55X25ML10T15 3627.78,918.66 r90 bottom
R35 "1 MΩ" RESC1608X55X25ML10T15 3547.78,919.13 r90 bottom
R36 "1 MΩ" RESC1608X55X25ML10T15 3467.78,918.66 r90 bottom
R37 "1 MΩ" RESC1608X55X25ML10T15 3787.78,1049.13 r90 bottom
R38 "1 MΩ" RESC1608X55X25ML10T15 3707.78,919.13 r90 bottom
R39 "1 MΩ" RESC1608X55X25ML10T15 3787.78,918.66 r90 bottom
R40 "240 Ω , 1%" RESC0603(1608)_L 3049,1769.56 r270 top value="240.00 Ohm"
R41 "22 Ω" FP-RC0603-0_55-IPC_C 4448,2529 r180 top
R42 "22 Ω" FP-RC0603-0_55-IPC_C 4513,2351.36 r270 top
R43 "240 Ω , 1%" RESC0603(1608)_L 4208,2528 r180 top value="240.00 Ohm"
R44 "10 kΩ ±5%" RESC1608X55X25ML10T15 4089.47,2546 r180 top
R45 "10 kΩ ±5%" RESC1608X55X25ML10T15 4523,2230.47 r90 top
R46 "10 kΩ ±5%" RESC1608X55X25ML10T15 4326.47,2545 r180 top
R47 "470 Ω" RESC1608X55X25LL10T15 4510,2450 r270 top
R48 "4.7 kΩ" RESC1608X55X25LL10T15 5353,1992 r0 top
R49 "10 kΩ" RESC1608X55X25ML10T15 5340,1861 r0 top
R50 "22 Ω" FP-RC0603-0_55-IPC_C 5351,1936 r0 top
R51 "10 Ω" RESC2013X60X35ML10T20 5212,1967 r180 top
R52 "10 kΩ" RESC1608X55X25ML10T15 5342,2181 r0 top
R53 "10 kΩ" RESC1608X55X25ML10T15 1572.32,1804.27 r90 top
R54 "4.7 kΩ" RESC1608X55X25LL10T15 1664.32,1850.8 r180 top
R55 "10 kΩ" RESC1608X55X25ML10T15 1681.32,1656.32 r90 top
R56 "10 kΩ" RESC1608X55X25ML10T15 1761.32,1656.8 r90 top
R57 "10 kΩ" RESC1608X55X25ML10T15 2001.32,1656.32 r90 top
R58 "10 kΩ" RESC1608X55X25ML10T15 2161.32,1656.8 r90 top
R59 "10 kΩ" RESC1608X55X25ML10T15 2241.32,1656.32 r90 top
R60 "10 kΩ" RESC1608X55X25ML10T15 1841.32,1656.32 r90 top
R61 "10 kΩ" RESC1608X55X25ML10T15 1921.32,1656.32 r90 top
R62 "10 kΩ" RESC1608X55X25ML10T15 2081.32,1657.27 r90 top
R63 "22 Ω" FP-RC0603-0_55-IPC_C 2457,2066 r270 top
R64 "22 Ω" FP-RC0603-0_55-IPC_C 1664.32,1785.8 r0 top
R65 "47 k" RESC1608X55X25LL10T15 2394,1982 r90 top
R66 "10 kΩ" RESC1608X55X25ML10T15 4842,1407 r0 top
R67 "10 kΩ" RESC1608X55X25ML10T15 4866.47,1864 r0 top
R68 "10 kΩ" RESC1608X55X25ML10T15 4977.47,1408 r180 top
R69 "22 Ω" FP-RC0603-0_55-IPC_C 4983.36,1851 r180 top
R70 "22 Ω" FP-RC0603-0_55-IPC_C 2036,973 r0 top
R71 "2.2 kΩ" RESC1608X55X25LL10T15 1982,723 r270 top
R72 "330 Ω" RESC1608X55X25ML10T15 2062,748 r90 top
R73 "1 MΩ" FP-CRCW1206-e3-MFG 2707,298 r180 top
R74 "330 Ω" RESC1608X55X25ML10T15 2142,747.53 r90 top
R75 "2.2 kΩ" RESC1608X55X25LL10T15 1901,1473.59 r90 top
R76 "2.2 kΩ" RESC1608X55X25LL10T15 1851,1473.59 r90 top
R77 "10 kΩ" RESC1608X55X25ML10T15 1796,942.53 r270 top
R78 "2.2 kΩ" RESC1608X55X25LL10T15 2001,1473.59 r270 top
R79 "49.9Ω" RESC1608X55X25ML10T15 1656,1303 r0 top
R80 "49.9Ω" RESC1608X55X25ML10T15 1656.47,1143 r0 top
R81 "2.2 kΩ" RESC1608X55X25LL10T15 1951,1473.59 r270 top
R82 "1.5 kΩ" RESC1608X55X25ML10T15 1916.47,968 r0 top
R83 "49.9Ω" RESC1608X55X25ML10T15 1656,1383 r180 top
R84 "49.9Ω" RESC1608X55X25ML10T15 1656.47,1223 r180 top
R85 "2.2 kΩ" RESC1608X55X25LL10T15 2176,1263 r270 top
R86 "4.87 kΩ" RESC1608X55N#1 1696,1033 r270 top
R87 "2.2 kΩ" RESC1608X55X25LL10T15 1561,1233.59 r90 top
R88 "2.2 kΩ" RESC1608X55X25LL10T15 1561,1143 r270 top
R89 "1 kΩ" RESC1607X60N 1591,454 r90 top
R90 "1 kΩ" RESC1607X60N 708.76,432.28 r90 top
R91 "60 Ω" RESC1608X55X25ML10T15 460,760 r270 top
R92 "60 Ω" RESC1608X55X25ML10T15 480,965 r0 top
R93 "60 Ω" RESC1608X55X25ML10T15 462.28,1282.01 r0 top
R94 "60 Ω" RESC1608X55X25ML10T15 462.28,1360.75 r180 top
R95 "120Ω" RESC1608X55X25ML10T15 430,1810.47 r90 top
R96 "10 kΩ" RESC1608X55X25ML10T15 851.3,1796.93 r180 top
R97 "10 kΩ" RESC1608X55X25ML10T15 851.3,1885.51 r180 top
R98 "20 kΩ" FP-RT0603-MFG 320,1700 r180 top value=20KΩ
R99 "10 kΩ" RESC1608X55X25ML10T15 851.3,1708.35 r180 top
R100 "20 kΩ" FP-RT0603-MFG 320,1910 r180 top value=20KΩ
R101 "100 Ω" FP-RC0603-0_55-IPC_A 5534.48,759 r0 top
R102 "22 Ω" FP-RC0603-0_55-IPC_C 4314.53,1957.23 r0 top
R103 "22 Ω" FP-RC0603-0_55-IPC_C 4312.89,2037.23 r0 top
R104 "7.5 Ω" RESC1608X55X25ML10T15 5543,852 r0 top
R105 "22 Ω" FP-RC0603-0_55-IPC_C 4592.89,1632.23 r0 top
R106 "22 Ω" FP-RC0603-0_55-IPC_C 4591.25,1712.23 r0 top
R107 "22 Ω" FP-RC0603-0_55-IPC_C 4592.89,1792.23 r0 top
R108 "22 Ω" FP-RC0603-0_55-IPC_C 4592.89,1872.23 r0 top
R109 "22 Ω" FP-RC0603-0_55-IPC_C 4592.89,1952.23 r0 top
R110 "22 Ω" FP-RC0603-0_55-IPC_C 4312.91,1557.23 r0 top
R111 "22 Ω" FP-RC0603-0_55-IPC_C 4592.89,1152.23 r0 top
R112 "22 Ω" FP-RC0603-0_55-IPC_C 4596.25,1552.23 r0 top
R113 "22 Ω" FP-RC0603-0_55-IPC_C 4312.89,1797.23 r0 top
R114 "22 Ω" FP-RC0603-0_55-IPC_C 4314.56,1157.23 r0 top
R115 "22 Ω" FP-RC0603-0_55-IPC_C 4312.91,1237.23 r0 top
R116 "22 Ω" FP-RC0603-0_55-IPC_C 4312.89,1317.23 r0 top
R117 "22 Ω" FP-RC0603-0_55-IPC_C 4314.56,1397.23 r0 top
R118 "22 Ω" FP-RC0603-0_55-IPC_C 4314.56,1477.23 r0 top
R119 "22 Ω" FP-RC0603-0_55-IPC_C 4594.56,1232.23 r0 top
R120 "22 Ω" FP-RC0603-0_55-IPC_C 4592.89,1312.23 r0 top
R121 "22 Ω" FP-RC0603-0_55-IPC_C 3517,2237 r90 top
R122 "22 Ω" FP-RC0603-0_55-IPC_C 4592.89,1392.23 r0 top
R123 "22 Ω" FP-RC0603-0_55-IPC_C 3347,2235.64 r90 top
R124 "22 Ω" FP-RC0603-0_55-IPC_C 3403,2233.64 r90 top
R125 "22 Ω" FP-RC0603-0_55-IPC_C 4592.89,1472.23 r0 top
R126 "22 Ω" FP-RC0603-0_55-IPC_C 3461,2235.64 r90 top
R127 "22 Ω" FP-RC0603-0_55-IPC_C 4312.89,1637.23 r0 top
R128 "22 Ω" FP-RC0603-0_55-IPC_C 4312.89,1717.23 r0 top
R129 "22 Ω" FP-RC0603-0_55-IPC_C 4312.89,1877.23 r0 top
R130 "22 Ω" FP-RC0603-0_55-IPC_C 4591.25,2032.23 r0 top
R131 "10 kΩ" RESC1608X55X25ML10T15 5513.13,3170.02 r0 top
R132 "10 kΩ" RESC1608X55X25ML10T15 5513.13,3268.45 r0 top
R133 "10 kΩ" RESC1608X55X25ML10T15 5513.13,2766.48 r0 top
R134 "22 Ω" FP-RC0603-0_55-IPC_C 5525.85,3061.76 r0 top
R135 "10 kΩ" RESC1608X55X25ML10T15 5513.13,2973.17 r180 top
R136 "22 Ω" FP-RC0603-0_55-IPC_C 4917.26,3339.77 r180 top
R137 "22 Ω" FP-RC0603-0_55-IPC_C 5104.27,3339.77 r180 top
R138 "22 Ω" FP-RC0603-0_55-IPC_C 4700.72,3329.93 r180 top
R139 "22 Ω" FP-RC0603-0_55-IPC_C 4523.56,3329.93 r180 top
R140 "22 Ω" FP-RC0603-0_55-IPC_C 4326.71,3329.93 r180 top
R141 "22 Ω" FP-RC0603-0_55-IPC_C 4159.39,3329.93 r180 top
R142 "86.6 kΩ" 0603 895.46,3004 r180 top
R143 "10 kΩ" FP-RC0603-0_55-MFG 1338,3079 r180 top
R144 "133 kΩ" RESC1608X55N#2 349.98,2379 r270 top
R145 "100 kΩ" FP-RC0603-0_55-MFG 511.51,2509 r180 top
R146 "100 kΩ" FP-RC0603-0_55-MFG 156.51,2479 r180 top
R147 "0Ω" FP-RC0603-MFG 1298,3505.54 r270 top
R148 "332 kΩ" RESC1608X55X25ML10T15 778,3629 r180 top
R149 "124 kΩ" RESC1608X55X25NL10T15 379.98,2761.44 r270 top
R150 "10.2 kΩ" RESC1608X55X25LL10T15 1228,3544 r0 top
R151 "3.24 kΩ" FP-CRCW0603-e3-IPC_A 1055.1,3474 r180 top
R152 "68.1 kΩ" RESC1608X55X25LL10T15 797.41,3564 r0 top
R153 "100 kΩ" FP-RC0603-0_55-MFG 474.98,2734 r180 top
R154 "29.4 kΩ" RESC1608X55X25ML10T15 1253,3739 r0 top
R155 "100 kΩ" FP-RC0603-0_55-MFG 243.44,2874 r180 top
R156 "10 kΩ" RESC1608X55X25ML10T15 2505.79,3716.03 r90 top
R157 "10 kΩ" RESC1608X55X25ML10T15 2507,3575.53 r90 top
R158 "10 kΩ" RESC1608X55X25ML10T15 2529,3222 r180 top
R159 "0Ω" FP-RC0603-MFG 2430,3505.46 r90 top
R160 "68 kΩ" RESC1608X55X25LL10T15 2201,3701 r0 top
R161 "33 kΩ" RESC1608X55X25LL10T15 2166,3837 r0 top
R162 "23.2kΩ" RESC1608X55X25LL10T15 2452,3828 r90 top
R163 "22 kΩ" RESC1608X55X25ML10T15 2548.31,3905.5 r180 top
R164 "10 kΩ" RESC1608X55X25ML10T15 2181.47,3770 r0 top
R165 "10 kΩ" RESC1608X55X25ML10T15 2294,3850.53 r270 top
R166 "10 kΩ" RESC1608X55X25ML10T15 2381,3851.53 r270 top
R167 "10 kΩ" RESC1608X55X25ML10T15 2548.79,3825.5 r180 top
R168 "1K , 1%" RESC1607X60N 899.12,2774.06 r270 top
R169 "1K , 1%" RESC1607X60N 749,2768 r90 top
R170 "10 kΩ" RESC1608X55X25ML10T15 2860.16,2966.47 r90 top
R171 "10 kΩ" RESC1608X55X25ML10T15 2860.16,2835.99 r270 top
R172 "10 kΩ" RESC1608X55X25ML10T15 2854.16,3316.52 r90 top
R173 "10 kΩ" RESC1608X55X25ML10T15 2854.16,3186.99 r270 top
R174 "22 Ω" FP-RC0603-0_55-IPC_C 3516,308.64 r90 top
R175 "22 Ω" FP-RC0603-0_55-IPC_C 3045,308 r90 top
R176 "22 Ω" FP-RC0603-0_55-IPC_C 3458,308.64 r90 top
R177 "22 Ω" FP-RC0603-0_55-IPC_C 3646,313 r90 top
R178 "22 Ω" FP-RC0603-0_55-IPC_C 4069,318 r90 top
R179 "10 kΩ" RESC1608X55X25ML10T15 4900.5,355.31 r90 top
R180 "10 kΩ" RESC1608X55X25ML10T15 5035.5,509.36 r270 top
R181 "10 kΩ" RESC1608X55X25ML10T15 5250.5,130.31 r270 top
R182 "10 kΩ" RESC1608X55X25ML10T15 5200.5,539.36 r90 top
R183 "10 kΩ" RESC1608X55X25ML10T15 5280.5,539.83 r90 top
R184 "10 kΩ" RESC1608X55X25ML10T15 5115.5,509.83 r90 top
R185 "12k" RESC1608X55X25NL10T15 5169,137.56 r270 top
R186 "22 Ω" FP-RC0603-0_55-IPC_C 4902,238.36 r270 top
R200 "22 Ω" FP-RC0603-0_55-IPC_C 3288,2236.64 r90 top
SDCLK0_N "" KEYSTONE_5277 4659,2421 r0 top
SDCLK0_P "" KEYSTONE_5277 4654,2256 r0 top
SW1 "" PTS645SM43SMTR92LFS_MFG 2182,2976 r270 top
SW2 "" PTS645SM43SMTR92LFS_MFG 2539.94,2979.06 r270 top
T1 "WE-RJ45_7498010210A" J00-00XXNL 2209.5,244.74 r180 top
U1 "24MHZ" ASVMB_ABR 2947.5,1305.98 r90 top
U2 "MT41K256M16TW-107:P" FP-TW-IPC_C 4193.69,2333.22 r90 top
U3 "S40FC004C1B1I00000" BGA153N50P14X14_1150X1300X80 1988.21,2037.84 r180 top
U4 "W25Q128JVSIQ" SOIC127P790X216-8N#1 4916.94,1636.23 r90 top
U5 "DP83848IVV/NOPB" PT0048A_N 1936.47,1219.34 r270 top
U6 "TPD2E001DRYR" DRY0006A 1519,422.84 r90 top
U7 "TPD2E001DRYR" DRY0006A 748.13,176.38 r180 bottom
U8 "TJA1051T/3,118" NXP-SOIC-8_L 945,820 r180 top
U9 "TJA1051T/3,118" NXP-SOIC-8_L 943.35,1330 r180 top
U10 "MAX3485EESA+T" SOIC127P600X175-8N 623.94,1821.14 r180 top
U11 "TPS5405DR" SOIC127P599X175-8N 1128,3104 r0 top
U12 "TPS54331DR" D0008A_M 1013,3644 r0 top
U13 "TPS386000RGPT" FP-RGP0020A-MFG 2355.47,3677.53 r180 top
U14 "TPS3808G33" DBV6_M 2347.35,3349.81 r270 top
U15 "ESP8266EX" ESFS-QFN-32_L 5059,325.31 r180 top
U16 "SPI_Flash" SOIC127P790X216-8N#2 4513.27,172 r0 top
U17 "TLV70218DBVT" SOT95P280X145-5N 814.5,2540 r0 top
U79 "Component_3" BGA289C80P17X17_1400X1400X132 3530.02,1648.98 r180 top
WIFI_TOUT "" KEYSTONE_5277 5552,151 r180 top (schematic designator WF_TOUT)
Y1 "32.768 kHz" XTAL_ECS-.327-6-34RR-TR 2918,1565 r270 top
Y2 "ASV-50.000MHZ-EJ-T" XTAL_ASV-50.000MHZ-EJ-T 2391,1014 r270 top
Y3 "26 MHZ" FP-ABM8G-MFG 4999,117 r90 top

## Footprints (in the part's own frame and the unit in brackets; to place one, negate y for a bottom-side part, rotate by r counter-clockwise, add the part's x,y. Pads: shape width x height; smd on the part's side, far side on the other; paste and mask are expansions set on the pad)
0603 [mm]
  rect 1.1x1 smd paste+0 mask+0.102: 1(-0.85,0) 2(0.85,0)
  body extent -0.8,-0.4 0.8,0.4, height 0.55
104031-0811_MOL [mil]
  rect 32x45 smd: 1(122.24,-217.38) 2(78.94,-217.38) 3(35.63,-217.38) 4(-7.68,-217.38) 5(-50.98,-217.38) 6(-94.29,-217.38) 7(-137.6,-217.38) 8(-180.91,-217.38)
  rect 49x41 smd: 9(225.98,24.74) 10(225.98,170.41)
  rect 63x55 smd: 11(219.09,-212.46)
  rect 48x73 smd: 12(-226.57,-203.6)
  rect 77x55 smd: 13(-146.85,208.8) 14(88.19,208.8)
  silkscreen extent -243,-232 243,232, body extent -249,-245 279,310, height 47
61202021621 [mm] "20 pins, straight, gold plating"
  rrect50% 1.6x1.6 hole 1.1: 1(-11.43,-1.27)
  round 1.6 hole 1.1: 2(-11.43,1.27) 3(-8.89,-1.27) 4(-8.89,1.27) 5(-6.35,-1.27) 6(-6.35,1.27) 7(-3.81,-1.27) 8(-3.81,1.27) 9(-1.27,-1.27) 10(-1.27,1.27) 11(1.27,-1.27) 12(1.27,1.27) 13(3.81,-1.27) 14(3.81,1.27) 15(6.35,-1.27) 16(6.35,1.27) 17(8.89,-1.27) 18(8.89,1.27) 19(11.43,-1.27) 20(11.43,1.27)
  silkscreen extent -16.63,-4.5 16.63,4.5, body extent -16.53,-4.42 16.53,4.75, height 9.13
61302011121 [mm]
  round 1.65 hole 1.1: 1(-24.13,0) 2(-21.59,0) 3(-19.05,0) 4(-16.51,0) 5(-13.97,0) 6(-11.43,0) 7(-8.89,0) 8(-6.35,0) 9(-3.81,0) 10(-1.27,0) 11(1.27,0) 12(3.81,0) 13(6.35,0) 14(8.89,0) 15(11.43,0) 16(13.97,0) 17(16.51,0) 18(19.05,0) 19(21.59,0) 20(24.13,0)
  silkscreen extent -25.5,-1.37 25.5,1.37, body extent -25.4,-1.27 25.4,1.27, height 7.27
ASVMB_ABR [mil]
  rect 59x53 smd paste+0 mask+0: 1(-83,100) 2(-83,-100) 3(83,-100) 4(83,100)
  rect 138x87 smd paste+0 mask+0: 5(0,0)
  silkscreen extent -318,-145 106,145, body extent -101,-140 101,140, height 35
BGA153N50P14X14_1150X1300X80 [mm]
  round 0.35 smd mask+0.055: A1(-3.25,3.25) A2(-2.75,3.25) A3(-2.25,3.25) A4(-1.75,3.25) A5(-1.25,3.25) A6(-0.75,3.25) A7(-0.25,3.25) A8(0.25,3.25) A9(0.75,3.25) A10(1.25,3.25) A11(1.75,3.25) A12(2.25,3.25) A13(2.75,3.25) A14(3.25,3.25) B1(-3.25,2.75) B2(-2.75,2.75) B3(-2.25,2.75) B4(-1.75,2.75) B5(-1.25,2.75) B6(-0.75,2.75) B7(-0.25,2.75) B8(0.25,2.75) B9(0.75,2.75) B10(1.25,2.75) B11(1.75,2.75) B12(2.25,2.75) B13(2.75,2.75) B14(3.25,2.75) C1(-3.25,2.25) C2(-2.75,2.25) C3(-2.25,2.25) C4(-1.75,2.25) C5(-1.25,2.25) C6(-0.75,2.25) C7(-0.25,2.25) C8(0.25,2.25) C9(0.75,2.25) C10(1.25,2.25) C11(1.75,2.25) C12(2.25,2.25) C13(2.75,2.25) C14(3.25,2.25) D1(-3.25,1.75) D2(-2.75,1.75) D3(-2.25,1.75) D4(-1.75,1.75) D12(2.25,1.75) D13(2.75,1.75) D14(3.25,1.75) E1(-3.25,1.25) E2(-2.75,1.25) E3(-2.25,1.25) E5(-1.25,1.25) E6(-0.75,1.25) E7(-0.25,1.25) E8(0.25,1.25) E9(0.75,1.25) E10(1.25,1.25) E12(2.25,1.25) E13(2.75,1.25) E14(3.25,1.25) F1(-3.25,0.75) F2(-2.75,0.75) F3(-2.25,0.75) F5(-1.25,0.75) F10(1.25,0.75) F12(2.25,0.75) F13(2.75,0.75) F14(3.25,0.75) G1(-3.25,0.25) G2(-2.75,0.25) G3(-2.25,0.25) G5(-1.25,0.25) G10(1.25,0.25) G12(2.25,0.25) G13(2.75,0.25) G14(3.25,0.25) H1(-3.25,-0.25) H2(-2.75,-0.25) H3(-2.25,-0.25) H5(-1.25,-0.25) H10(1.25,-0.25) H12(2.25,-0.25) H13(2.75,-0.25) H14(3.25,-0.25) J1(-3.25,-0.75) J2(-2.75,-0.75) J3(-2.25,-0.75) J5(-1.25,-0.75) J10(1.25,-0.75) J12(2.25,-0.75) J13(2.75,-0.75) J14(3.25,-0.75) K1(-3.25,-1.25) K2(-2.75,-1.25) K3(-2.25,-1.25) K5(-1.25,-1.25) K6(-0.75,-1.25) K7(-0.25,-1.25) K8(0.25,-1.25) K9(0.75,-1.25) K10(1.25,-1.25) K12(2.25,-1.25) K13(2.75,-1.25) K14(3.25,-1.25) L1(-3.25,-1.75) L2(-2.75,-1.75) L3(-2.25,-1.75) L12(2.25,-1.75) L13(2.75,-1.75) L14(3.25,-1.75) M1(-3.25,-2.25) M2(-2.75,-2.25) M3(-2.25,-2.25) M4(-1.75,-2.25) M5(-1.25,-2.25) M6(-0.75,-2.25) M7(-0.25,-2.25) M8(0.25,-2.25) M9(0.75,-2.25) M10(1.25,-2.25) M11(1.75,-2.25) M12(2.25,-2.25) M13(2.75,-2.25) M14(3.25,-2.25) N1(-3.25,-2.75) N2(-2.75,-2.75) N3(-2.25,-2.75) N4(-1.75,-2.75) N5(-1.25,-2.75) N6(-0.75,-2.75) N7(-0.25,-2.75) N8(0.25,-2.75) N9(0.75,-2.75) N10(1.25,-2.75) N11(1.75,-2.75) N12(2.25,-2.75) N13(2.75,-2.75) N14(3.25,-2.75) P1(-3.25,-3.25) P2(-2.75,-3.25) P3(-2.25,-3.25) P4(-1.75,-3.25) P5(-1.25,-3.25) P6(-0.75,-3.25) P7(-0.25,-3.25) P8(0.25,-3.25) P9(0.75,-3.25) P10(1.25,-3.25) P11(1.75,-3.25) P12(2.25,-3.25) P13(2.75,-3.25) P14(3.25,-3.25)
  silkscreen extent -6.4,-6.5 5.75,6.5, body extent -5.75,-6.5 5.75,6.5, height 0.8
BGA289C80P17X17_1400X1400X132 [mm]
  round 0.37 smd: A1(-6.4,6.4) A2(-5.6,6.4) A3(-4.8,6.4) A4(-4,6.4) A5(-3.2,6.4) A6(-2.4,6.4) A7(-1.6,6.4) A8(-0.8,6.4) A9(0,6.4) A10(0.8,6.4) A11(1.6,6.4) A12(2.4,6.4) A13(3.2,6.4) A14(4,6.4) A15(4.8,6.4) A16(5.6,6.4) A17(6.4,6.4) B1(-6.4,5.6) B2(-5.6,5.6) B3(-4.8,5.6) B4(-4,5.6) B5(-3.2,5.6) B6(-2.4,5.6) B7(-1.6,5.6) B8(-0.8,5.6) B9(0,5.6) B10(0.8,5.6) B11(1.6,5.6) B12(2.4,5.6) B13(3.2,5.6) B14(4,5.6) B15(4.8,5.6) B16(5.6,5.6) B17(6.4,5.6) C1(-6.4,4.8) C2(-5.6,4.8) C3(-4.8,4.8) C4(-4,4.8) C5(-3.2,4.8) C6(-2.4,4.8) C7(-1.6,4.8) C8(-0.8,4.8) C9(0,4.8) C10(0.8,4.8) C11(1.6,4.8) C12(2.4,4.8) C13(3.2,4.8) C14(4,4.8) C15(4.8,4.8) C16(5.6,4.8) C17(6.4,4.8) D1(-6.4,4) D2(-5.6,4) D3(-4.8,4) D4(-4,4) D5(-3.2,4) D6(-2.4,4) D7(-1.6,4) D8(-0.8,4) D9(0,4) D10(0.8,4) D11(1.6,4) D12(2.4,4) D13(3.2,4) D14(4,4) D15(4.8,4) D16(5.6,4) D17(6.4,4) E1(-6.4,3.2) E2(-5.6,3.2) E3(-4.8,3.2) E4(-4,3.2) E5(-3.2,3.2) E6(-2.4,3.2) E7(-1.6,3.2) E8(-0.8,3.2) E9(0,3.2) E10(0.8,3.2) E11(1.6,3.2) E12(2.4,3.2) E13(3.2,3.2) E14(4,3.2) E15(4.8,3.2) E16(5.6,3.2) E17(6.4,3.2) F1(-6.4,2.4) F2(-5.6,2.4) F3(-4.8,2.4) F4(-4,2.4) F5(-3.2,2.4) F6(-2.4,2.4) F7(-1.6,2.4) F8(-0.8,2.4) F9(0,2.4) F10(0.8,2.4) F11(1.6,2.4) F12(2.4,2.4) F13(3.2,2.4) F14(4,2.4) F15(4.8,2.4) F16(5.6,2.4) F17(6.4,2.4) G1(-6.4,1.6) G2(-5.6,1.6) G3(-4.8,1.6) G4(-4,1.6) G5(-3.2,1.6) G6(-2.4,1.6) G7(-1.6,1.6) G8(-0.8,1.6) G9(0,1.6) G10(0.8,1.6) G11(1.6,1.6) G12(2.4,1.6) G13(3.2,1.6) G14(4,1.6) G15(4.8,1.6) G16(5.6,1.6) G17(6.4,1.6) H1(-6.4,0.8) H2(-5.6,0.8) H3(-4.8,0.8) H4(-4,0.8) H5(-3.2,0.8) H6(-2.4,0.8) H7(-1.6,0.8) H8(-0.8,0.8) H9(0,0.8) H10(0.8,0.8) H11(1.6,0.8) H12(2.4,0.8) H13(3.2,0.8) H14(4,0.8) H15(4.8,0.8) H16(5.6,0.8) H17(6.4,0.8) J1(-6.4,0) J2(-5.6,0) J3(-4.8,0) J4(-4,0) J5(-3.2,0) J6(-2.4,0) J7(-1.6,0) J8(-0.8,0) J9(0,0) J10(0.8,0) J11(1.6,0) J12(2.4,0) J13(3.2,0) J14(4,0) J15(4.8,0) J16(5.6,0) J17(6.4,0) K1(-6.4,-0.8) K2(-5.6,-0.8) K3(-4.8,-0.8) K4(-4,-0.8) K5(-3.2,-0.8) K6(-2.4,-0.8) K7(-1.6,-0.8) K8(-0.8,-0.8) K9(0,-0.8) K10(0.8,-0.8) K11(1.6,-0.8) K12(2.4,-0.8) K13(3.2,-0.8) K14(4,-0.8) K15(4.8,-0.8) K16(5.6,-0.8) K17(6.4,-0.8) L1(-6.4,-1.6) L2(-5.6,-1.6) L3(-4.8,-1.6) L4(-4,-1.6) L5(-3.2,-1.6) L6(-2.4,-1.6) L7(-1.6,-1.6) L8(-0.8,-1.6) L9(0,-1.6) L10(0.8,-1.6) L11(1.6,-1.6) L12(2.4,-1.6) L13(3.2,-1.6) L14(4,-1.6) L15(4.8,-1.6) L16(5.6,-1.6) L17(6.4,-1.6) M1(-6.4,-2.4) M2(-5.6,-2.4) M3(-4.8,-2.4) M4(-4,-2.4) M5(-3.2,-2.4) M6(-2.4,-2.4) M7(-1.6,-2.4) M8(-0.8,-2.4) M9(0,-2.4) M10(0.8,-2.4) M11(1.6,-2.4) M12(2.4,-2.4) M13(3.2,-2.4) M14(4,-2.4) M15(4.8,-2.4) M16(5.6,-2.4) M17(6.4,-2.4) N1(-6.4,-3.2) N2(-5.6,-3.2) N3(-4.8,-3.2) N4(-4,-3.2) N5(-3.2,-3.2) N6(-2.4,-3.2) N7(-1.6,-3.2) N8(-0.8,-3.2) N9(0,-3.2) N10(0.8,-3.2) N11(1.6,-3.2) N12(2.4,-3.2) N13(3.2,-3.2) N14(4,-3.2) N15(4.8,-3.2) N16(5.6,-3.2) N17(6.4,-3.2) P1(-6.4,-4) P2(-5.6,-4) P3(-4.8,-4) P4(-4,-4) P5(-3.2,-4) P6(-2.4,-4) P7(-1.6,-4) P8(-0.8,-4) P9(0,-4) P10(0.8,-4) P11(1.6,-4) P12(2.4,-4) P13(3.2,-4) P14(4,-4) P15(4.8,-4) P16(5.6,-4) P17(6.4,-4) R1(-6.4,-4.8) R2(-5.6,-4.8) R3(-4.8,-4.8) R4(-4,-4.8) R5(-3.2,-4.8) R6(-2.4,-4.8) R7(-1.6,-4.8) R8(-0.8,-4.8) R9(0,-4.8) R10(0.8,-4.8) R11(1.6,-4.8) R12(2.4,-4.8) R13(3.2,-4.8) R14(4,-4.8) R15(4.8,-4.8) R16(5.6,-4.8) R17(6.4,-4.8) T1(-6.4,-5.6) T2(-5.6,-5.6) T3(-4.8,-5.6) T4(-4,-5.6) T5(-3.2,-5.6) T6(-2.4,-5.6) T7(-1.6,-5.6) T8(-0.8,-5.6) T9(0,-5.6) T10(0.8,-5.6) T11(1.6,-5.6) T12(2.4,-5.6) T13(3.2,-5.6) T14(4,-5.6) T15(4.8,-5.6) T16(5.6,-5.6) T17(6.4,-5.6) U1(-6.4,-6.4) U2(-5.6,-6.4) U3(-4.8,-6.4) U4(-4,-6.4) U5(-3.2,-6.4) U6(-2.4,-6.4) U7(-1.6,-6.4) U8(-0.8,-6.4) U9(0,-6.4) U10(0.8,-6.4) U11(1.6,-6.4) U12(2.4,-6.4) U13(3.2,-6.4) U14(4,-6.4) U15(4.8,-6.4) U16(5.6,-6.4) U17(6.4,-6.4)
  silkscreen extent -7.1,-7 7,7.1
CAPC1005X55N [mm]
  rect 0.54x0.6 smd: 1(-0.432,0) 2(0.432,0)
  body extent -0.5,-0.25 0.5,0.25, height 0.55
CAPC1005X55X25ML05T10 [mm] "Chip Capacitor, 2-Leads, Body 1.00x0.50mm, IPC Low Density"
  rect 0.76x0.72 smd: 1(-0.49,0) 2(0.49,0)
  body extent -0.53,-0.28 0.53,0.27, height 0.55
CAPC1608X90 [mm]
  rect 1.1x1 smd: 1(-0.85,0) 2(0.85,0)
  silkscreen extent -0.15,-0.45 0.15,0.45, body extent -0.8,-0.4 0.8,0.4, height 0.9
CAPC1608X90X35ML10T15 [mm] "Chip Capacitor, 2-Leads, Body 1.7x0.9mm, IPC Low Density"
  rect 0.95x1.05 smd: 1(-0.725,0) 2(0.725,0)
  body extent -0.85,-0.45 0.85,0.45, height 0.9
CAPC1608X90X35NL10T15 [mm] "Chip Capacitor, 2-Leads, Body 1.60x0.80mm, IPC Medium Density"
  rect 0.85x0.95 smd: 1(-0.675,0) 2(0.675,0)
  body extent -0.85,-0.45 0.85,0.45, height 0.9
CAPC1608X90X40ML10T20 [mm] "Chip Capacitor, 2-Leads, Body 1.7x0.9mm, IPC Low Density"
  rect 1.05x1.05 smd: 1(-0.675,0) 2(0.675,0)
  body extent -0.85,-0.45 0.85,0.45, height 0.9
CAPC1608X90X40NL10T20 [mm] "Chip Capacitor, 2-Leads, Body 1.7x0.9mm, IPC Medium Density"
  rect 0.95x0.95 smd: 1(-0.625,0) 2(0.625,0)
  body extent -0.85,-0.45 0.85,0.45, height 0.9
CAPC3216X110N [mm]
  rect 1.16x1.82 smd: 1(-1.475,0) 2(1.475,0)
  silkscreen extent -0.57,-0.9 0.57,0.9, body extent -1.6,-0.8 1.6,0.8, height 1.8
CUI_PJ-102AH [mm]
  oval 1.508x3.016 hole 1 square: 1(-6.5,0) 2(-0.5,0)
  oval 3.016x1.508 hole 1 square: 3(-3.5,4.7)
  silkscreen extent -8.3,-4.5 7.2,4.5, body extent -7.03,-4.7 7.37,4.7, height 12.63
D0008A_M [mm] "SOIC, 8-Leads, Body 5x4mm, Pitch 1.27mm, IPC Low Density"
  rrect15% 1.65x0.65 smd: 1(-2.825,1.905) 2(-2.825,0.635) 3(-2.825,-0.635) 4(-2.825,-1.905) 5(2.825,-1.905) 6(2.825,-0.635) 7(2.825,0.635) 8(2.825,1.905)
  silkscreen extent -2.95,-2.5 1.6,2.9, body extent -3,-2.45 3,2.45, height 1.63
DBV6_M [mm] "SOT23, 6-Leads, Body 2.9x1.6mm, Pitch 0.95mm, Lead Span 2.8mm, IPC Low Density"
  rect 1.3x0.7 smd: 1(-1.2,0.95) 2(-1.2,0) 3(-1.2,-0.95) 4(1.2,-0.95) 5(1.2,0) 6(1.2,0.95)
  silkscreen extent -1.32,-1.55 0.15,1.98, body extent -0.87,-1.52 0.87,1.53, height 1.45
DRY0006A [mm] "SON, 6-Leads, Body 1.45x1mm, Pitch 0.5mm"
  rrect33% 0.52x0.3 smd: 1(-0.37,0.5)
  rrect33% 0.49x0.3 smd: 2(-0.385,0) 3(-0.385,-0.5) 4(0.385,-0.5) 5(0.385,0) 6(0.385,0.5)
  silkscreen extent -1.08,0.45 -0.98,0.55, body extent -0.5,-0.72 0.5,0.72, height 0.6
ESFS-QFN-32_L [mm] "QFN, 32-Leads, Body 5.05x5.05mm, Pitch 0.50mm, Thermal Pad 3.70x3.70mm, IPC High Density"
  oval 0.7x0.25 smd: 1(-2.375,1.75) 2(-2.375,1.25) 3(-2.375,0.75) 4(-2.375,0.25) 5(-2.375,-0.25) 6(-2.375,-0.75) 7(-2.375,-1.25) 8(-2.375,-1.75) 17(2.375,-1.75) 18(2.375,-1.25) 19(2.375,-0.75) 20(2.375,-0.25) 21(2.375,0.25) 22(2.375,0.75) 23(2.375,1.25) 24(2.375,1.75)
  oval 0.25x0.7 smd: 9(-1.75,-2.375) 10(-1.25,-2.375) 11(-0.75,-2.375) 12(-0.25,-2.375) 13(0.25,-2.375) 14(0.75,-2.375) 15(1.25,-2.375) 16(1.75,-2.375) 25(1.75,2.375) 26(1.25,2.375) 27(0.75,2.375) 28(0.25,2.375) 29(-0.25,2.375) 30(-0.75,2.375) 31(-1.25,2.375) 32(-1.75,2.375)
  rect 3.7x3.7 smd: 33(0,0)
  silkscreen extent -3.45,-2.67 2.68,2.68, body extent -2.52,-2.52 2.53,2.53, height 0.9
FP-0603-L_1_6_0_2-W_0_8_0-IPC_B [mil]
  rect 41.64x39.85 smd paste+0 mask+0: 1(-28.63,0) 2(28.63,0)
  silkscreen extent -49,-36 49,36, body extent -59,-30 59,30, height 10
FP-1206L050YR-MFG [mm]
  rect 1x1.8 smd paste+0 mask+0: 1(-1.4,0) 2(1.4,0)
  silkscreen extent -0.53,-0.9 0.53,0.9, body extent -2,-1 2,1, height 0.25
FP-ABM8G-MFG [mm]
  rect 1.4x1.2 smd paste+0 mask+0: 1(-1.1,-0.85) 2(1.1,-0.85) 3(1.1,0.85) 4(-1.1,0.85)
  silkscreen extent -2.47,-1.83 1.6,1.83, body extent -1.9,-1.55 1.9,1.55, height 0.25
FP-B82789C0513N002-0#1 [mm]
  rect 1.85x1.7 smd paste+0 mask+0: 1(-2.025,1.15) 2(2.025,1.15) 3(2.025,-1.15) 4(-2.025,-1.15)
  silkscreen extent -3.63,-1.75 0.72,1.75, body extent -2.47,-1.76 2.47,1.65, height 3
FP-B82789C0513N002-0#2 [mm]
  rect 1.85x1.7 smd paste+0 mask+0: 1(-2.025,-1.15) 2(2.025,-1.15) 3(2.025,1.15) 4(-2.025,1.15)
  silkscreen extent -3.62,-1.75 0.72,1.75, body extent -3.05,-2.1 3.05,2.1, height 0.25
FP-BLM18-0_15-t0_8-IPC_A [mil]
  rect 51.42x41.66 smd paste+0 mask+0: 1(-30.55,0) 2(30.55,0)
  silkscreen extent -56,-37 56,37, body extent -76,-41 76,41, height 10
FP-BLM21-0_2-t0_85-e0_5-IPC_C [mil]
  rect 41.53x53.39 smd paste+0 mask+0: 1(-28.57,0) 2(28.57,0)
  silkscreen extent -49,-44 49,44, body extent -53,-32 53,32, height 10
FP-C0603C-CF-MFG [mm]
  rect 0.75x0.9 smd paste+0 mask+0: 1(-0.6,0) 2(0.6,0)
  silkscreen extent -0.87,-0.85 0.88,0.85, body extent -1.2,-0.6 1.2,0.6, height 0.25
FP-C1210C472KGRAC7800-MFG [mm]
  rect 0.95x2.6 smd paste+0 mask+0: 1(-1.4,0) 2(1.4,0)
  silkscreen extent -0.55,-1.35 0.55,1.35, body extent -1.6,-1.25 1.6,1.25, height 2.3
FP-CC0603-DA-MFG [mm]
  rect 0.8x0.9 smd paste+0 mask+0: 1(-0.75,0) 2(0.75,0)
  silkscreen extent -0.85,-0.85 0.85,0.85, body extent -0.8,-0.4 0.8,0.4, height 0.9
FP-CC0603-DC-IPC_C [mil]
  rect 37.59x35.68 smd paste+0 mask+0: 1(-22.66,0) 2(22.66,0)
  silkscreen extent -41,-35 41,35, body extent -31,-16 31,16, height 39
FP-CC0603-DC-MFG [mm]
  rect 0.8x0.9 smd paste+0 mask+0: 1(-0.75,0) 2(0.75,0)
  silkscreen extent -0.85,-0.87 0.85,0.87, body extent -0.8,-0.4 0.8,0.4, height 1
FP-CRCW0603-e3-IPC_A [mil]
  rect 44.69x41.82 smd paste+0 mask+0: 1(-32.1,0) 2(32.1,0)
  silkscreen extent -30,-37 30,37, body extent -74,-41 74,41, height 10
FP-CRCW1206-e3-MFG [mm]
  rect 1.05x1.8 smd paste+0 mask+0: 1(-1.275,0) 2(1.275,0)
  silkscreen extent -0.38,-0.87 0.38,0.87, body extent -1.6,-0.8 1.6,0.8, height 0.6
FP-DQA0010A-MFG [mm]
  rrect50% 0.565x0.2 smd paste+0 mask+0: 1(-0.417,1) 2(-0.417,0.5) 4(-0.417,-0.5) 5(-0.417,-1) 6(0.417,-1) 7(0.417,-0.5) 9(0.417,0.5) 10(0.417,1)
  rrect25% 0.565x0.4 smd paste-1000 mask+0: 3(-0.417,0) 8(0.417,0)
  silkscreen extent -1.38,-1.48 0.55,1.48, body extent -0.5,-1.25 0.5,1.25, height 0.55
FP-FH12-40S-0_5SH_55-MFG [mm]
  rect 0.3x1.3 smd paste-1000 mask+0: 1(-9.75,3.45) 2(-9.25,3.45) 3(-8.75,3.45) 4(-8.25,3.45) 5(-7.75,3.45) 6(-7.25,3.45) 7(-6.75,3.45) 8(-6.25,3.45) 9(-5.75,3.45) 10(-5.25,3.45) 11(-4.75,3.45) 12(-4.25,3.45) 13(-3.75,3.45) 14(-3.25,3.45) 15(-2.75,3.45) 16(-2.25,3.45) 17(-1.75,3.45) 18(-1.25,3.45) 19(-0.75,3.45) 20(-0.25,3.45) 21(0.25,3.45) 22(0.75,3.45) 23(1.25,3.45) 24(1.75,3.45) 25(2.25,3.45) 26(2.75,3.45) 27(3.25,3.45) 28(3.75,3.45) 29(4.25,3.45) 30(4.75,3.45) 31(5.25,3.45) 32(5.75,3.45) 33(6.25,3.45) 34(6.75,3.45) 35(7.25,3.45) 36(7.75,3.45) 37(8.25,3.45) 38(8.75,3.45) 39(9.25,3.45) 40(9.75,3.45)
  rect 1.8x2.2 smd paste+0 mask+0: 41(-11.65,0.2) 42(11.65,0.2)
  silkscreen extent -11.65,-2.95 11.65,4.77, body extent -12.65,-3.05 12.65,4.2, height 0.25
FP-GRM188-0_2-IPC_B [mil]
  rect 43.51x39.61 smd paste+0 mask+0: 1(-27.58,0) 2(27.58,0)
  silkscreen extent -49,-36 49,36, body extent -59,-30 59,30, height 10
FP-HSMC-C280-MFG [mm]
  rect 0.5x0.5 smd paste+0 mask+0: 1(-0.5,0) 2(0.5,0)
  silkscreen extent -1.45,-0.65 0.55,0.65, body extent -0.85,-0.4 0.85,0.4, height 0.25
FP-HSMG-C150-MFG [mm]
  rect 1.5x1.5 smd paste+0 mask+0: 1(-1.75,0) 2(1.75,0)
  silkscreen extent -0.6,-0.85 0.6,0.85, body extent -2.6,-0.95 2.6,0.95, height 0.25
FP-LQW15AN_80-MFG [mm]
  rect 0.41x0.66 smd paste+0 mask+0: 1(-0.505,0) 2(0.505,0)
  silkscreen extent -0.56,-0.74 0.55,0.75, body extent -0.81,-0.45 0.81,0.45, height 0.25
FP-PG-SOT23-3-MFG [mm]
  rect 0.9x0.8 smd paste+0 mask+0: 1(-1.1,1) 2(-1.1,-1) 3(1.1,0)
  silkscreen extent -0.28,-1.5 0.7,1.5, body extent -1.65,-1.6 1.65,1.6, height 0.25
FP-RC0603-0_55-IPC_A [mil]
  rect 41.68x39.85 smd paste+0 mask+0: 1(-34.52,0) 2(34.52,0)
  silkscreen extent -55,-36 55,36, body extent -75,-40 75,40, height 10
FP-RC0603-0_55-IPC_C [mil]
  rect 25.93x31.97 smd paste+0 mask+0: 1(-26.64,0) 2(26.64,0)
  silkscreen extent -40,-33 40,33, body extent -44,-22 44,22, height 10
FP-RC0603-0_55-MFG [mm]
  rect 0.9x0.8 smd paste+0 mask+0: 1(-0.85,0) 2(0.85,0)
  silkscreen extent 0,-0.45 0,0.45, body extent -1.4,-0.55 1.4,0.55, height 0.25
FP-RC0603-MFG [mm]
  rect 0.9x0.8 smd paste+0 mask+0: 1(-0.85,0) 2(0.85,0)
  silkscreen extent -0.03,-0.45 0.03,0.45, body extent -0.8,-0.4 0.8,0.4, height 0.55